# Altium PCB PCB.PcbDoc (part 1 of 4)
Units mm, origin at the board's own origin, x right, y up, seen from the top; angles counter-clockwise.
Board outline 147.57 x 62.6 mm, 4 copper layers (Top Layer, Layer 1, Layer 2, Bottom Layer), stack 1.586 mm thick; 192 components, 139 nets, 594 pads, 161 vias.
Unrouted connection lines stored in the file: 1.
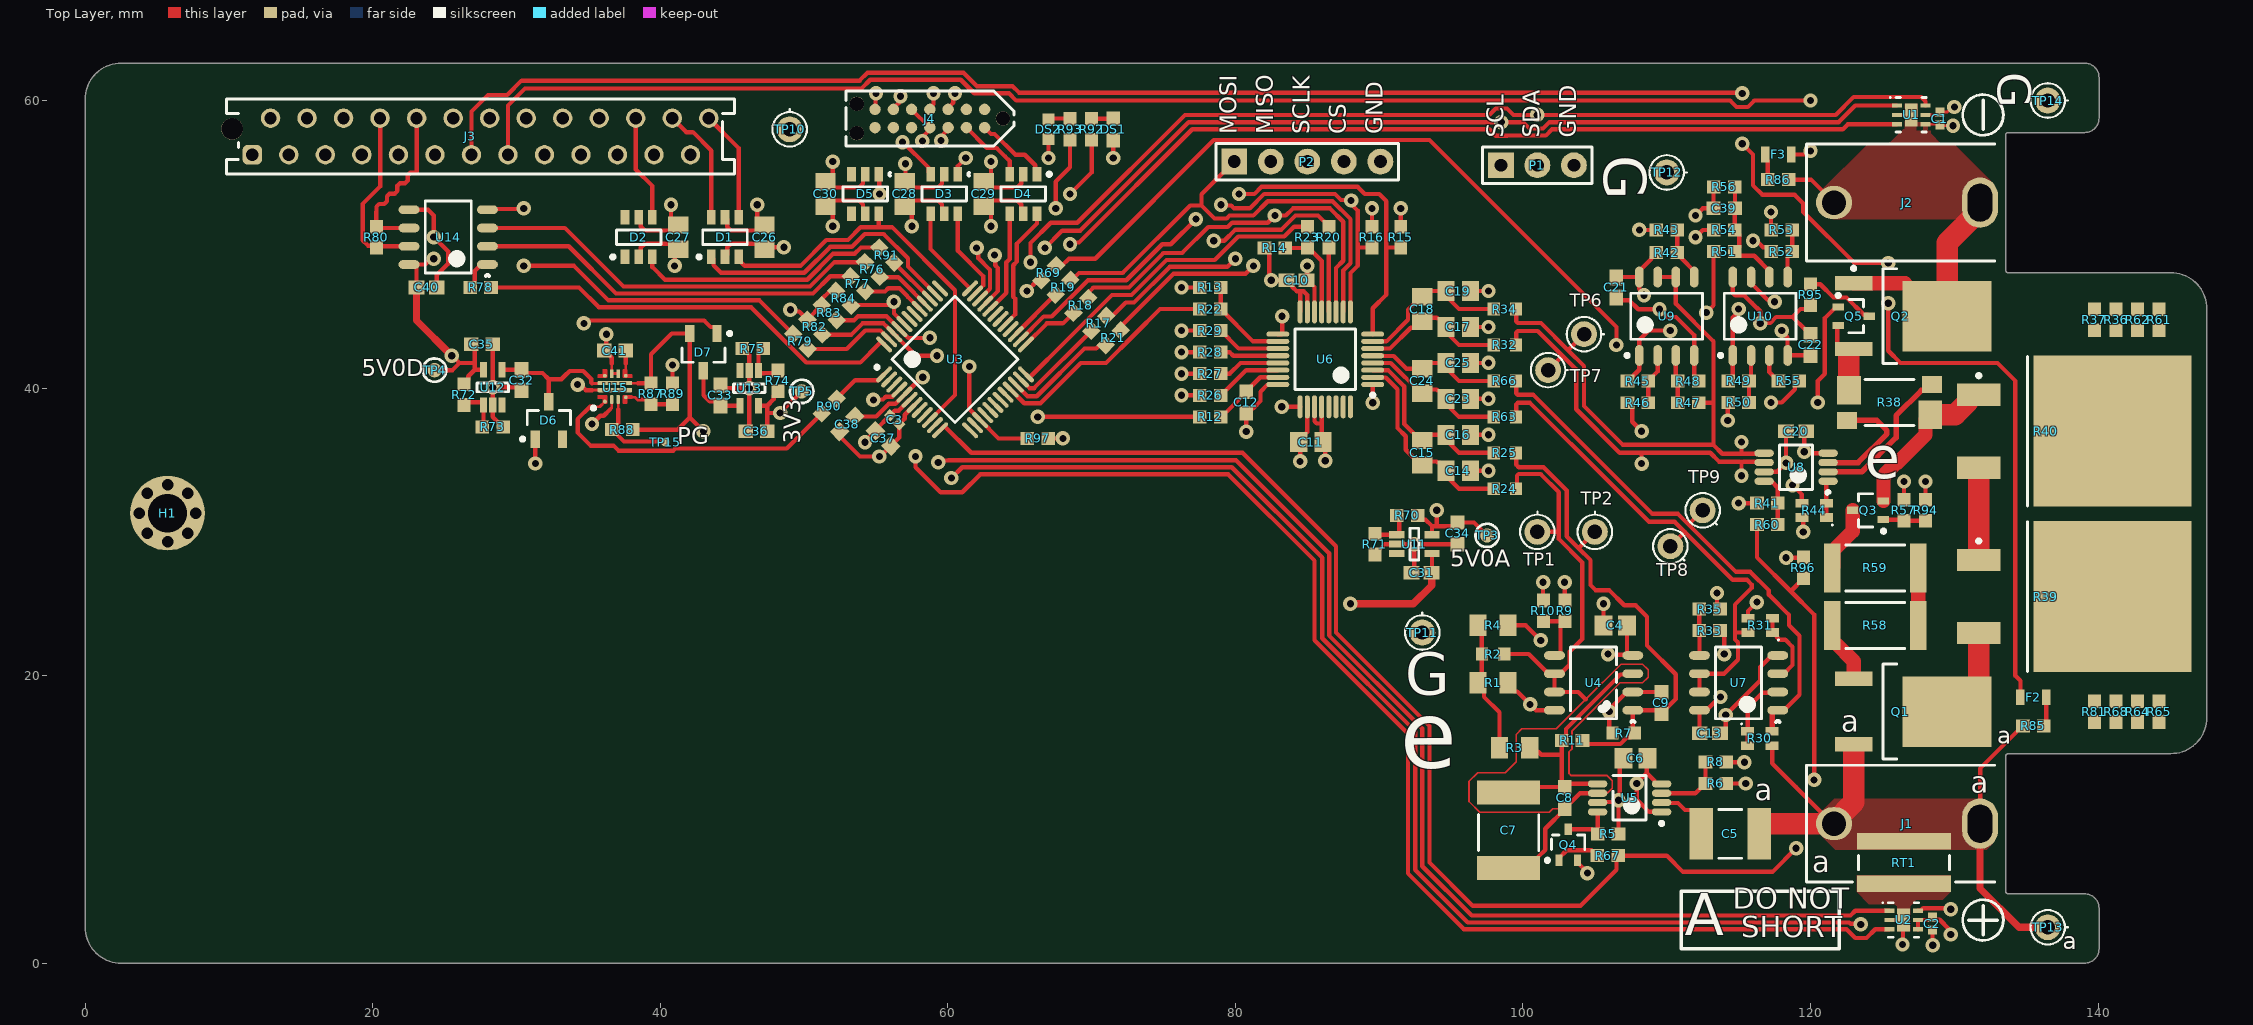
[diagram p0: Top Layer view]
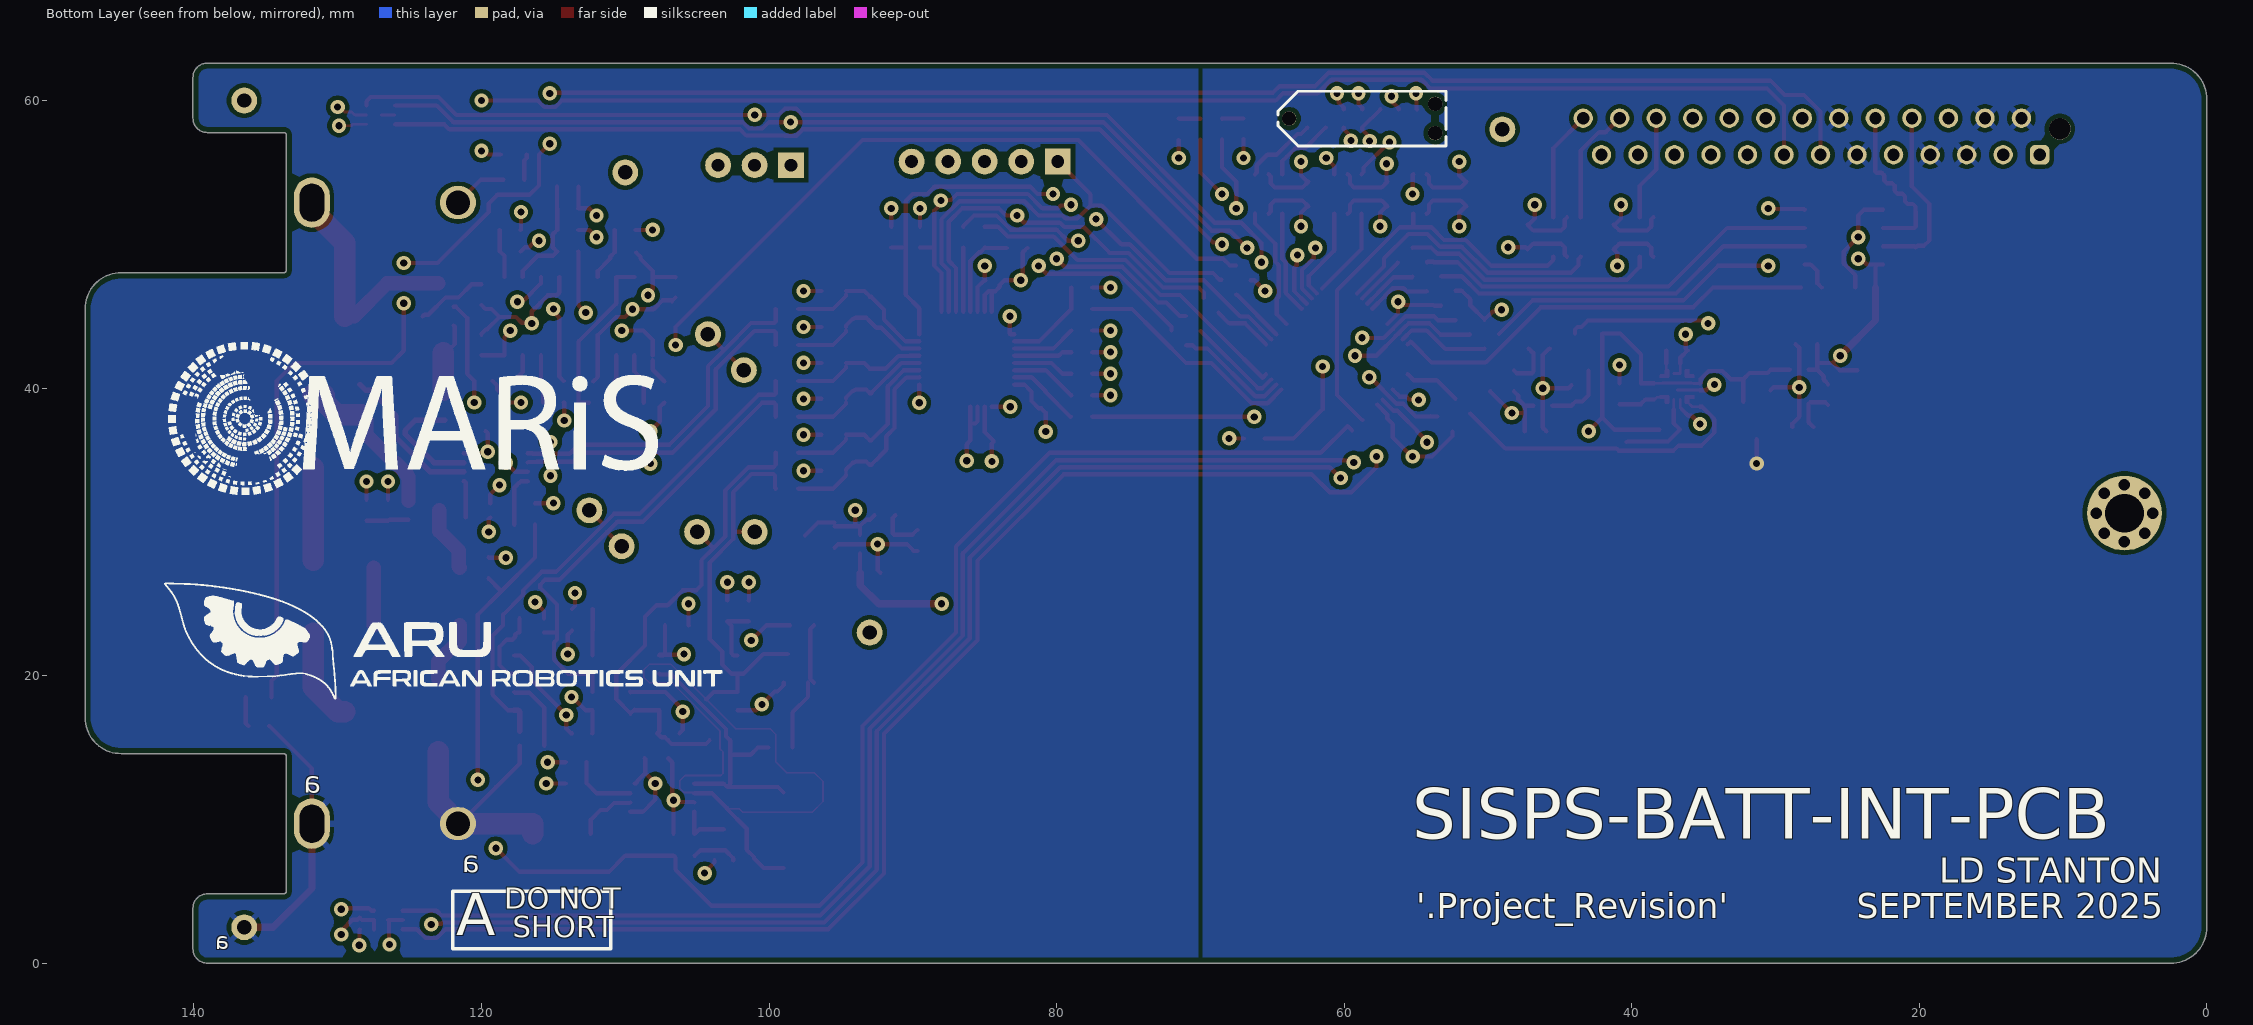
[diagram p1: Bottom Layer view, seen from below]
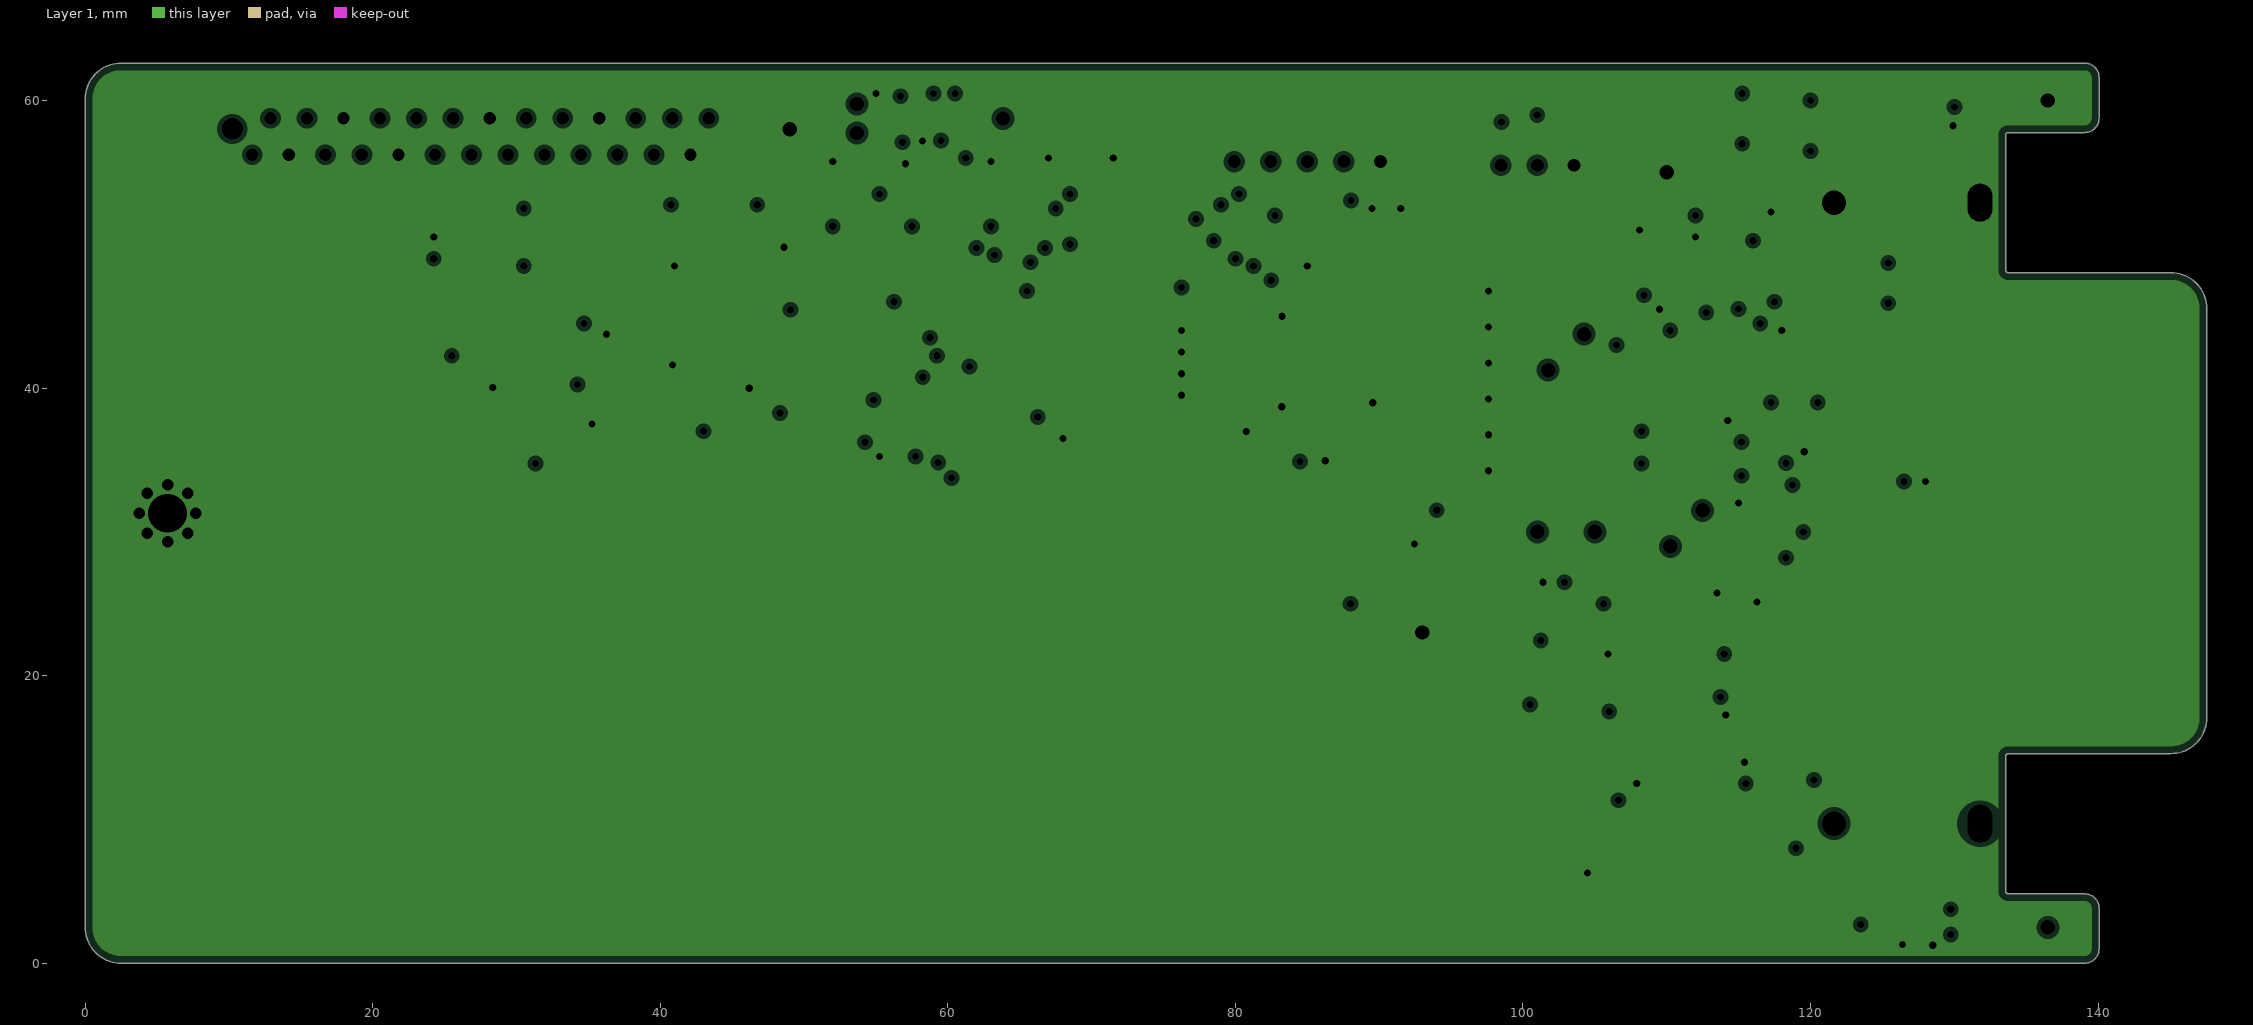
[diagram p2: Layer 1, clearances drawn from the general rule]
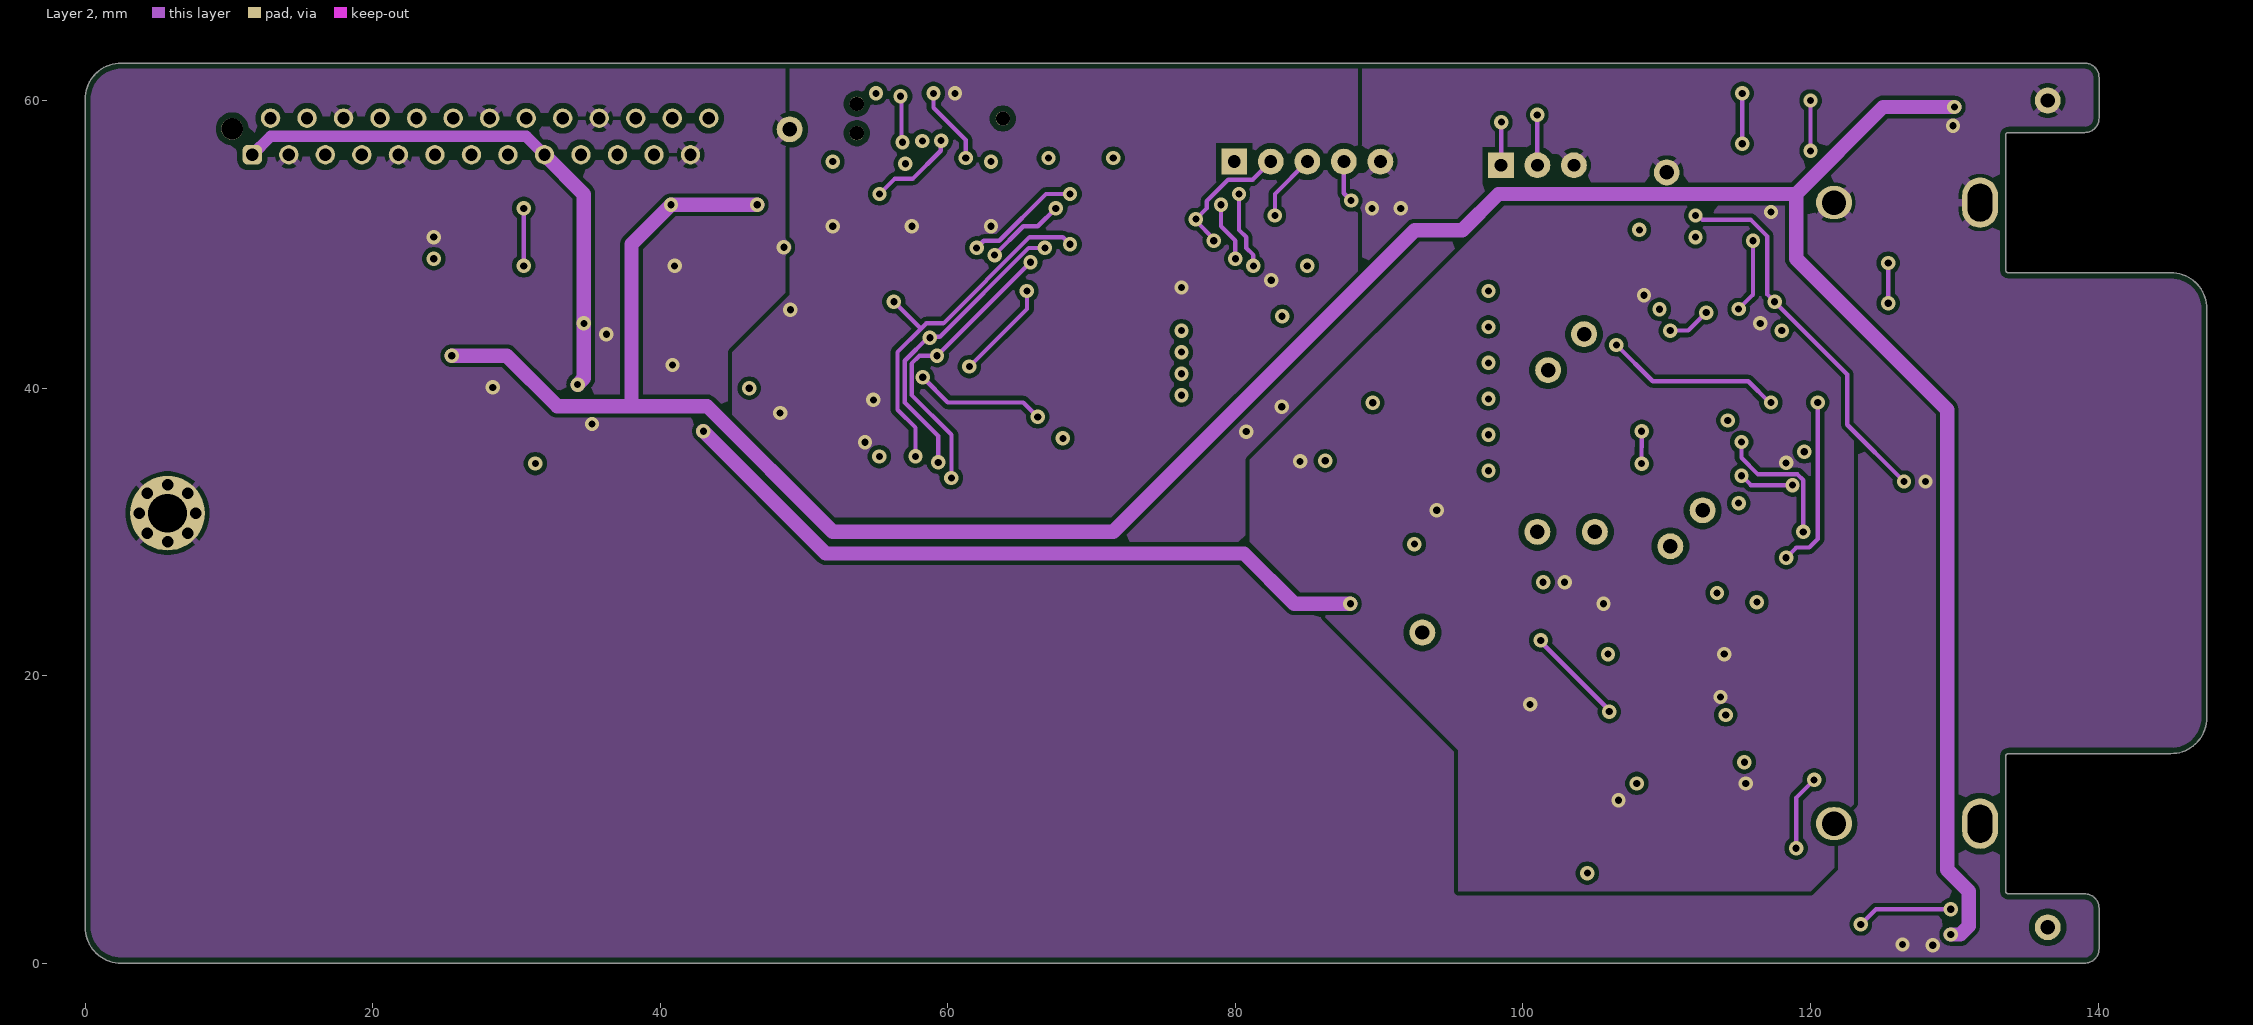
[diagram p3: Layer 2]
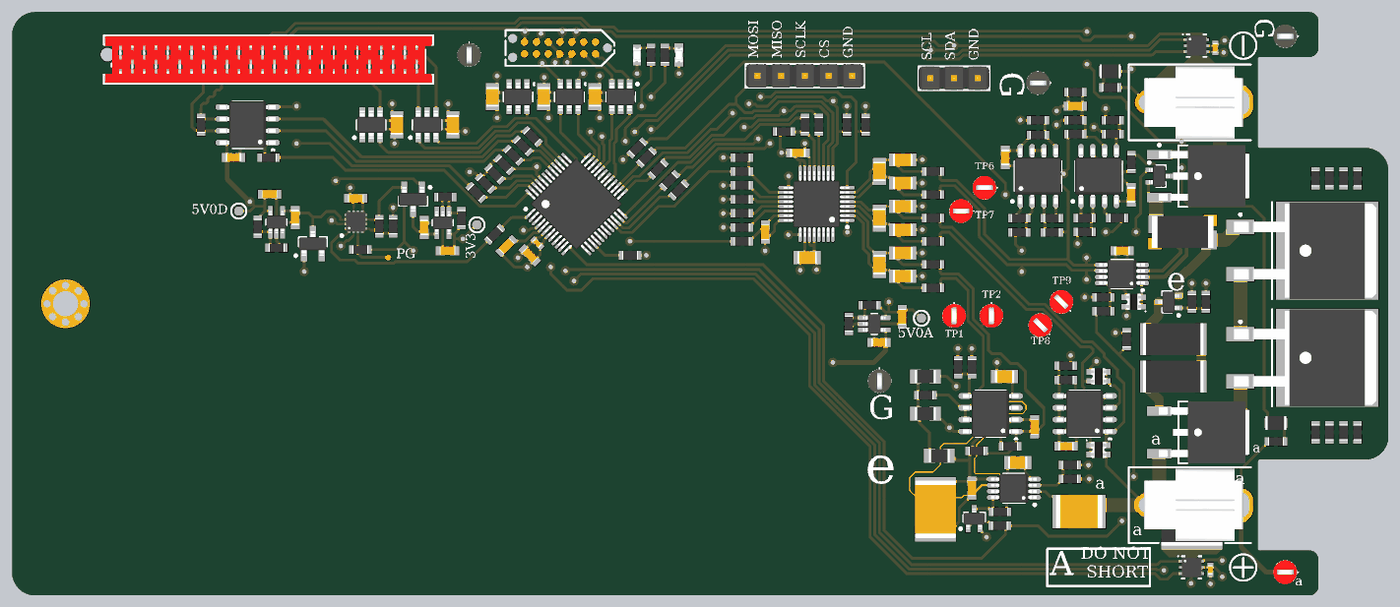
[diagram p6: 3D render of the assembled board from above, using the file's embedded part models]

## Layer stack, top to bottom
Top Solder: solder mask 0.013, SM-002, Dk 3.8
Top Layer: signal copper 0.035
PP1: prepreg 0.2104, PP-022, Dk 4.6
Layer 1: plane copper 0.0152, net GND
Core: core 1.065, FR-4, Dk 4.3
Layer 2: signal copper 0.0152
PP2: prepreg 0.2104, PP-022, Dk 4.6
Bottom Layer: signal copper 0.035
Bottom Solder: solder mask 0.013, SM-002, Dk 3.8

## Board outline
2.498,0.002 cw(c2.498,2.502) -0.002,2.502 -0.002,60.102 cw(c2.498,60.102) 2.498,62.602 139.067,62.602 cw(c139.067,61.602) 140.067,61.602 140.067,58.776 cw(c139.067,58.776) 139.067,57.776 133.767,57.776 ccw(c133.767,57.576) 133.567,57.576 133.567,48.225 ccw(c133.767,48.225) 133.767,48.025 145.067,48.025 cw(c145.067,45.525) 147.567,45.525 147.567,17.078 cw(c145.067,17.078) 145.067,14.578 133.767,14.578 ccw(c133.767,14.378) 133.567,14.378 133.567,5.027 ccw(c133.767,5.027) 133.767,4.827 139.067,4.827 cw(c139.067,3.827) 140.067,3.827 140.067,1.002 cw(c139.067,1.002) 139.067,0.002

## Design rules (kind name [scope] priority, off if disabled: settings)
BoardOutlineClearance [All] p1: gap=0.4 ignorepadtopadclearanceinfootprint=FALSE
Clearance Clearance_IdealDiode [WithinRoom('IdealDiode') vs WithinRoom('IdealDiode')] p1: gap=0.3 ignorepadtopadclearanceinfootprint=TRUE except(0.1: Arc-SMDPad Arc-Fill Arc-Poly Arc-Region Track-SMDPad Track-Fill Track-Poly Track-Region; 0.15: SMDPad-Text THPad-Text; 0.18: Arc-Arc Arc-Track Track-Track; 0.2: SMDPad-Fill SMDPad-Poly SMDPad-Region Fill-Fill Fill-Poly Fill-Region Poly-Poly Poly-Region Region-Region; 0.25: SMDPad-SMDPad; 0.4: Arc-THPad Track-THPad; 0.5: THPad-THPad)
Clearance "Schematic Clearance Constraint_1" [InNet('NetR1_2')] p2: gap=0.5 ignorepadtopadclearanceinfootprint=TRUE
Clearance Clearance_VRMS [InNet('VRMS_DC') vs not InNet('EIS_VRMS_N')] p3: gap=0.5 ignorepadtopadclearanceinfootprint=TRUE
Clearance Clearance_InnerLayerHole [IsVia or IsPad vs OnMid] p4: gap=0 ignorepadtopadclearanceinfootprint=TRUE except(0.15: Arc-Via Track-Via; 0.3: Via-Fill Via-Poly Via-Region; 0.4: THPad-Fill THPad-Poly THPad-Region)
Clearance Clearance_Samenet [All] p5 off: gap=0.1 ignorepadtopadclearanceinfootprint=TRUE
Clearance Clearance_DifNet [All] p6: gap=0.3 ignorepadtopadclearanceinfootprint=TRUE except(0.15: Arc-SMDPad Track-SMDPad SMDPad-Text THPad-Text; 0.18: Arc-Arc Arc-Track Track-Track; 0.2: SMDPad-Fill SMDPad-Poly SMDPad-Region; 0.25: SMDPad-SMDPad; 0.4: Arc-THPad Track-THPad; 0.5: THPad-THPad)
ComponentClearance ComponentClearance_QFN [Footprint Like '*QFN*'] p1: gap=1 collisioncheckmode=3 verticalgap=0.3 showdistances=FALSE donotcheckwithout3dbody=TRUE
ComponentClearance ComponentClearance_QFP/QFP [Footprint Like '*QFP*' vs Footprint Like '*QFP*'] p2: gap=1.5 collisioncheckmode=3 verticalgap=2540 showdistances=FALSE donotcheckwithout3dbody=TRUE
ComponentClearance ComponentClearance_QFP/SOP-SOIC [Footprint Like '*QFP*' vs Footprint Like '*SOP*' or Comment Like '*SOP*' or  Footprint Like '*SOIC*' or Comment Like '*SOIC*'] p3: gap=1.5 collisioncheckmode=3 verticalgap=2540 showdistances=FALSE donotcheckwithout3dbody=TRUE
ComponentClearance ComponentClearance_QFP/SOT [Footprint Like '*QFP*' vs Footprint Like '*SOT*' or Comment Like '*SOT*'] p4: gap=1.5 collisioncheckmode=3 verticalgap=2540 showdistances=FALSE donotcheckwithout3dbody=TRUE
ComponentClearance ComponentClearance_QFP/Chip [Footprint Like '*QFP*' vs HasParameterValue('Package','0402') or HasParameterValue('Package','0603') or HasParameterValue('Package','0805') or HasParameterValue('Package','1206') or HasParameterValue('Case/Package','0402') or HasParameterValue('Case/Package','0603') or HasParameterValue('Case/Package','0805') or HasParameterValue('Case/Package','1206') or Comment Like '*0402*' or Comment Like '*0603*' or Comment Like '*0805*' or Comment Like '*1206*'] p5: gap=0.6 collisioncheckmode=3 verticalgap=2540 showdistances=FALSE donotcheckwithout3dbody=TRUE
ComponentClearance ComponentClearance_SOP-SOIC/SOT [Footprint Like '*SOT*' or Comment Like '*SOT*' vs Footprint Like '*SOP*' or Comment Like '*SOP*' or  Footprint Like '*SOIC*' or Comment Like '*SOIC*'] p6: gap=0.5 collisioncheckmode=3 verticalgap=2540 showdistances=FALSE donotcheckwithout3dbody=TRUE
ComponentClearance ComponentClearance_SOP-SOIC/Chip [HasParameterValue('Package','0402') or HasParameterValue('Package','0603') or HasParameterValue('Package','0805') or HasParameterValue('Package','1206') or HasParameterValue('Case/Package','0402') or HasParameterValue('Case/Package','0603') or HasParameterValue('Case/Package','0805') or HasParameterValue('Case/Package','1206') or Comment Like '*0402*' or Comment Like '*0603*' or Comment Like '*0805*' or Comment Like '*1206*' vs Footprint Like '*SOP*' or Comment Like '*SOP*' or  Footprint Like '*SOIC*' or Comment Like '*SOIC*'] p7: gap=0.5 collisioncheckmode=3 verticalgap=2540 showdistances=FALSE donotcheckwithout3dbody=TRUE
ComponentClearance ComponentClearance_SOT/SOT [Footprint Like '*SOT*' or Comment Like '*SOT*' vs Footprint Like '*SOT*' or Comment Like '*SOT*'] p8: gap=0.3 collisioncheckmode=3 verticalgap=2540 showdistances=FALSE donotcheckwithout3dbody=TRUE
ComponentClearance ComponentClearance_SOT/Chip [HasParameterValue('Package','0402') or HasParameterValue('Package','0603') or HasParameterValue('Package','0805') or HasParameterValue('Package','1206') or HasParameterValue('Case/Package','0402') or HasParameterValue('Case/Package','0603') or HasParameterValue('Case/Package','0805') or HasParameterValue('Case/Package','1206') or Comment Like '*0402*' or Comment Like '*0603*' or Comment Like '*0805*' or Comment Like '*1206*' vs Footprint Like '*SOT*' or Comment Like '*SOT*'] p9: gap=0.3 collisioncheckmode=3 verticalgap=2540 showdistances=FALSE donotcheckwithout3dbody=TRUE
ComponentClearance ComponentClearance_0402/0402 [HasParameterValue('Package','0402') or HasParameterValue('Case/Package','0402') or Comment Like '*0402*' vs HasParameterValue('Package','0402') or HasParameterValue('Case/Package','0402') or Comment Like '*0402*'] p10: gap=0.2 collisioncheckmode=3 verticalgap=0.3 showdistances=FALSE donotcheckwithout3dbody=TRUE
ComponentClearance ComponentClearance_0402/0603 [HasParameterValue('Package','0402') or HasParameterValue('Case/Package','0402') or Comment Like '*0402*' vs HasParameterValue('Package','0603') or HasParameterValue('Case/Package','0603') or Comment Like '*0603*'] p11: gap=0.2 collisioncheckmode=3 verticalgap=0.3 showdistances=FALSE donotcheckwithout3dbody=TRUE
ComponentClearance ComponentClearance_0402/0805 [HasParameterValue('Package','0402') or HasParameterValue('Case/Package','0402') or Comment Like '*0402*' vs HasParameterValue('Package','0805') or HasParameterValue('Case/Package','0805') or Comment Like '*0805*'] p12: gap=0.25 collisioncheckmode=3 verticalgap=0.3 showdistances=FALSE donotcheckwithout3dbody=TRUE
ComponentClearance ComponentClearance_0402/1206 [HasParameterValue('Package','0402') or HasParameterValue('Case/Package','0402') or Comment Like '*0402*' vs HasParameterValue('Package','1206') or HasParameterValue('Case/Package','1206') or Comment Like '*1206*'] p13: gap=0.3 collisioncheckmode=3 verticalgap=0.3 showdistances=FALSE donotcheckwithout3dbody=TRUE
ComponentClearance ComponentClearance_0603/0603 [HasParameterValue('Package','0603') or HasParameterValue('Case/Package','0603') or Comment Like '*0603*' vs HasParameterValue('Package','0603') or HasParameterValue('Case/Package','0603') or Comment Like '*0603*'] p14: gap=0.2 collisioncheckmode=3 verticalgap=0.3 showdistances=FALSE donotcheckwithout3dbody=TRUE
ComponentClearance ComponentClearance_0603/0805 [HasParameterValue('Package','0603') or HasParameterValue('Case/Package','0603') or Comment Like '*0603*' vs HasParameterValue('Package','0805') or HasParameterValue('Case/Package','0805') or Comment Like '*0805*'] p15: gap=0.2 collisioncheckmode=3 verticalgap=0.3 showdistances=FALSE donotcheckwithout3dbody=TRUE
ComponentClearance ComponentClearance_0603/1206 [HasParameterValue('Package','0603') or HasParameterValue('Case/Package','0603') or Comment Like '*0603*' vs HasParameterValue('Package','1206') or HasParameterValue('Case/Package','1206') or Comment Like '*1206*'] p16: gap=0.3 collisioncheckmode=3 verticalgap=0.3 showdistances=FALSE donotcheckwithout3dbody=TRUE
ComponentClearance ComponentClearance_0805/0805 [HasParameterValue('Package','0805') or HasParameterValue('Case/Package','0805') or Comment Like '*0805*' vs HasParameterValue('Package','0805') or HasParameterValue('Case/Package','0805') or Comment Like '*0805*'] p17: gap=0.3 collisioncheckmode=3 verticalgap=0.3 showdistances=FALSE donotcheckwithout3dbody=TRUE
ComponentClearance ComponentClearance_0805/1206 [HasParameterValue('Package','0805') or HasParameterValue('Case/Package','0805') or Comment Like '*0805*' vs HasParameterValue('Package','1206') or HasParameterValue('Case/Package','1206') or Comment Like '*1206*'] p18: gap=0.3 collisioncheckmode=3 verticalgap=0.3 showdistances=FALSE donotcheckwithout3dbody=TRUE
ComponentClearance [All] p19: gap=0.254 collisioncheckmode=3 verticalgap=0.254 showdistances=FALSE
DiffPairsRouting [not InNet('1V0_VGND')] p1: maxlimit=0.5 minlimit=0.25 mostfreqgap=0.25 toplayer_minwidth=0.15 toplayer_maxwidth=0.5 toplayer_prefwidth=0.3 midlayer1_minwidth=0.15 midlayer1_maxwidth=0.5 midlayer1_prefwidth=0.3 bottomlayer_minwidth=0.15 bottomlayer_maxwidth=0.5 bottomlayer_prefwidth=0.3 maxuncoupledlength=12.7
DiffPairsRouting DiffPairsRouting_RS485 [InNetClass('MCU_RS485')] p2: maxlimit=0.5 minlimit=0.25 mostfreqgap=0.25 toplayer_minwidth=0.15 toplayer_maxwidth=0.5 toplayer_prefwidth=0.3 midlayer1_minwidth=0.15 midlayer1_maxwidth=0.5 midlayer1_prefwidth=0.3 bottomlayer_minwidth=0.15 bottomlayer_maxwidth=0.5 bottomlayer_prefwidth=0.3 maxuncoupledlength=12.7
HoleSize HoleSize_PSLT [(SlotHoleLength > 0) and (PadIsPlated = 'True')] p1: absolutevalues=TRUE maxlimit=6 minlimit=0.5 maxpercent=80.000 minpercent=20.000
HoleSize HoleSize_NPSLT [(SlotHoleLength > 0) and (PadIsPlated = 'False')] p2: absolutevalues=TRUE maxlimit=6.3 minlimit=1 maxpercent=80.000 minpercent=20.000
HoleSize HoleSize_NPTH [PadIsPlated = 'False'] p3: absolutevalues=TRUE maxlimit=6.3 minlimit=0.5 maxpercent=80.000 minpercent=20.000
HoleSize [All] p4: absolutevalues=TRUE maxlimit=6.3 minlimit=0.3 maxpercent=80.000 minpercent=20.000
MatchedLengths MatchedLengths_RS485 [InNetClass('MCU_RS485')] p1: tolerance=1 checknetsindiffpair=FALSE checkdiffpairvsdiffpair=TRUE checkxsignals=TRUE checkothers=TRUE
MinimumAnnularRing [PadIsPlated = 'True'] p1: minimumring=0.2
MinimumSolderMaskSliver [All] p1 off: minsoldermaskwidth=0.1
NetAntennae [All] p1: netantennaetolerance=2
PermittedLayers [All] p1: toplayerpermitted=TRUE bottomlayerpermitted=FALSE
PlaneClearance [All] p1: clearance=0.3
PlaneConnect PlaneConnect_BATT [HasFootprint('3547')] p1: planeconnectstyle=Relief reliefexpansion=0.5 reliefentries=4 reliefconductorwidth=1 reliefairgap=0.25 // Battery Terminal Connect
PlaneConnect [All] p2: pad.planeconnectstyle=Relief pad.reliefexpansion=0.5 pad.reliefentries=4 pad.reliefconductorwidth=0.3 pad.reliefairgap=0.25 via.planeconnectstyle=Direct via.reliefexpansion=0.508 via.reliefentries=4 via.reliefconductorwidth=0.254 via.reliefairgap=0.254
PolygonConnect [All] p1: thpad.connectstyle=Relief thpad.reliefconductorwidth=0.4 thpad.reliefentries=4 thpad.polygonreliefangle="45 Angle" thpad.airgapwidth=0.3 thpad.conductorbypadedge=TRUE thpad.mindistance=0.35 thpad.enablemindistance=FALSE smdpad.connectstyle=Relief smdpad.reliefconductorwidth=0.3 smdpad.reliefentries=4 smdpad.polygonreliefangle="90 Angle" smdpad.airgapwidth=0.3 smdpad.conductorbypadedge=TRUE smdpad.mindistance=0.35 smdpad.enablemindistance=FALSE via.connectstyle=Direct via.reliefconductorwidth=0.3 via.reliefentries=4 via.polygonreliefangle="45 Angle" via.airgapwidth=0.3
RoutingVias [All] p1: holewidth=0.5 width=0.8 viastyle="Through Hole" minholewidth=0.3 minwidth=0.5 maxholewidth=1 maxwidth=1.5
SilkToSilkClearance [All] p1 off: silktosilkclearance=0.15
SilkToSolderMaskClearance [IsPad] p1: minsilkscreentomaskgap=0.2 clearancetoexposedcopper=TRUE
SolderMaskExpansion "Schematic Solder Mask Expansion" [InNet('NetR1_2')] p1: expansion=0.2 istentingtop=FALSE
SolderMaskExpansion SolderMaskExpansion_Via [IsVia] p2: expansion=0.1 istentingtop=TRUE
SolderMaskExpansion [All] p3: expansion=0.075 istentingtop=FALSE
SupplyNets "Schematic Supply Nets_5" [InNet('VREG')] p1: voltage=0.000
SupplyNets "Schematic Supply Nets_11" [InNet('5V0D')] p2: voltage=0.000
SupplyNets "Schematic Supply Nets_10" [InNet('VAUX')] p3: voltage=0.000
SupplyNets "Schematic Supply Nets_9" [InNet('5V0A')] p4: voltage=0.000
SupplyNets "Schematic Supply Nets_8" [InNet('3V3')] p5: voltage=0.000
SupplyNets "Schematic Supply Nets_4" [InNet('VBUS')] p6: voltage=0.000
SupplyNets "Schematic Supply Nets_1" [InNet('VBATT')] p7: voltage=0.000
SupplyNets "Schematic Supply Nets" [InNet('GND')] p8: voltage=0.000
UnRoutedNet [All] p1: checkbadconnections=TRUE
Width Width_IdealDiode [WithinRoom('IdealDiode')] p1: maxlimit=0.2 minlimit=0.2 preferedwidth=0.2
Width Width_GR [InNet('EIS_VRMS_N')] p2: maxlimit=1 minlimit=0.12 preferedwidth=0.3 // Guard Ring Thin Traces
Width [All] p3: maxlimit=1.5 minlimit=0.2 preferedwidth=0.3
20 further rules are at their usual default settings.

## Classes and differential pairs
net class R97_Nets: GND MCU_DAC_OUT1
net class R96_Nets: EIS_EN NetQ5_1
net class R95_Nets: 5V0A NetQ5_3
net class R94_Nets: GND NetQ3_1
net class R57_Nets: EL_DRIVE NetQ3_1
net class Q5_Nets: NetQ2_3 NetQ5_1 NetQ5_3
net class P1_Nets: GND I2C_INT.SCL I2C_INT.SDA
net class P2_Nets: ADC_SPI.MISO C\S\_TERM DIN_TERM GND SCLK_TERM
net class R93_Nets: MCU_LED0 NetDS2_A
net class R92_Nets: MCU_LED1 NetDS1_A
net class DS2_Nets: GND NetDS2_A
net class DS1_Nets: GND NetDS1_A
net class R91_Nets: NetD2_3 OK
net class R90_Nets: AUX_5VEN NetR90_2
net class U15_Nets: GND NetC31_1 NetC41_1 NetR87_2 NetR88_2 NetR90_2 NetU15_10 VAUX
net class TP15_Nets: NetR88_2
net class R89_Nets: GND NetR87_2
net class R88_Nets: NetC31_1 NetR88_2
net class R87_Nets: NetC31_1 NetR87_2
net class D7_Nets: NetC31_1 NetC33_1 VAUX
net class D6_Nets: NetC31_1 VBUS VREG
net class C41_Nets: GND NetC41_1
net class TP14_Nets: GND
net class TP13_Nets: VBATT
net class TP12_Nets: GND
net class TP11_Nets: GND
net class TP10_Nets: GND
net class TP9_Nets: EIS_VBATT_P
net class TP8_Nets: EIS_VBATT_N
net class TP7_Nets: EIS_VISENSE_N
net class TP6_Nets: EIS_VISENSE_P
net class TP5_Nets: 3V3
net class TP4_Nets: 5V0D
net class TP3_Nets: 5V0A
net class TP1_Nets: EIS_VRMS_N
net class TP2_Nets: EIS_VRMS_P
net class R86_Nets: GND NetF3_1
net class R85_Nets: NetF2_1 VBATT
net class J1_Nets: VBATT
net class F3_Nets: BATT_SENSE_N NetF3_1
net class F2_Nets: BATT_SENSE_P NetF2_1
component class U_BATT: F2 F3 J1 J2 R85 R86 TP13 TP14
net class R53_Nets: GND NetR52_1
net class R51_Nets: EL_ISENSE_SE NetC39_1
net class C39_Nets: EL_DRIVE NetC39_1
net class R84_Nets: 3V3 I2C_INT_ALERT
net class R83_Nets: 3V3 I2C_INT.SCL
net class R82_Nets: 3V3 I2C_INT.SDA
net class U14_Nets: 5V0D GND RS485_DE RS485_DI RS485_MCU.A RS485_MCU.B RS485_R\E\ RS485_RO
net class RS485_MCU: RS485_MCU.A RS485_MCU.B
net class R81_Nets: RS485_SPARE_1 RS485_SPARE_2
net class R80_Nets: RS485_MCU.A RS485_MCU.B
net class R79_Nets: MCU_RS485_CTRL.UART.Tx RS485_DI
net class R78_Nets: MCU_RS485_CTRL.UART.Rx RS485_RO
net class R77_Nets: MCU_RS485_CTRL.R\E\ RS485_R\E\
net class R76_Nets: MCU_RS485_CTRL.DE RS485_DE
net class MCU_RS485: RS485_MCU.A RS485_MCU.B
net class MCU_RS485_CTRL: MCU_RS485_CTRL.DE MCU_RS485_CTRL.R\E\ MCU_RS485_CTRL.UART.Rx MCU_RS485_CTRL.UART.Tx
net class IDC_RS485: RS485_MCU.A RS485_MCU.B
net class C40_Nets: 5V0D GND
component class U_RS485: C40 R76 R77 R78 R79 R80 R81 U14
net class R69_Nets: MCU_DAC MCU_DAC_OUT1
net class R12_Nets: ADC_VREF MCU_VREF
net class C38_Nets: GND MCU_VREF
net class C37_Nets: 3V3 GND
net class C36_Nets: 3V3 GND
net class C35_Nets: 5V0D GND
net class C34_Nets: 5V0A GND
net class C33_Nets: GND NetC33_1
net class C32_Nets: GND NetC31_1
net class C31_Nets: GND NetC31_1
net class U13_Nets: 3V3 GND NetC33_1 NetR74_2 NetU13_3 NetU13_4
net class U12_Nets: 5V0D GND NetC31_1 NetR72_2 NetU12_3
net class U11_Nets: 5V0A GND NetC31_1 NetR70_2 NetU11_3
net class R75_Nets: GND NetR74_2
net class R74_Nets: 3V3 NetR74_2
net class R73_Nets: GND NetR72_2
net class R72_Nets: 5V0D NetR72_2
net class R71_Nets: GND NetR70_2
net class R70_Nets: 5V0A NetR70_2
component class U_LINREG: C31 C32 C33 C34 C35 C36 C41 D6 D7 R70 R71 R72 R73 R74 R75 R87 R88 R89 R90 TP3 TP4 TP5 TP15 U11 U12 U13 U15
net class MCU_I2C_INT: I2C_INT.SCL I2C_INT.SDA
net class MCU_ADC_SPI: ADC_SPI.\CS ADC_SPI.MISO ADC_SPI.MOSI ADC_SPI.SCLK
net class U3_Nets: 3V3 \RST ADC_D\R\D\Y\ ADC_R\S\T\ ADC_SPI.\CS ADC_SPI.MISO ADC_SPI.MOSI ADC_SPI.SCLK ADC_START AUX_5VEN EIS_EN EN GND I2C_INT.SCL I2C_INT.SDA I2C_INT_ALERT MCU_DAC_OUT1 MCU_LED0 MCU_LED1 MCU_RS485_CTRL.DE MCU_RS485_CTRL.R\E\ MCU_RS485_CTRL.UART.Rx MCU_RS485_CTRL.UART.Tx MCU_VREF NetU3_1 NetU3_2 NetU3_3 NetU3_4 NetU3_5 NetU3_8 NetU3_9 NetU3_11 NetU3_12 NetU3_13 NetU3_14 NetU3_15 NetU3_16 NetU3_17 NetU3_18 NetU3_19 NetU3_20 NetU3_21 NetU3_22 NetU3_23 NetU3_24 NetU3_25 NetU3_26 NetU3_27 NetU3_28 NetU3_29 NetU3_30 NetU3_31 NetU3_32 NetU3_33 NetU3_34 NetU3_37 NetU3_38 NetU3_39 NetU3_40 NetU3_41 NetU3_42 NetU3_43 NetU3_44 NetU3_45 NetU3_46 NetU3_47 NetU3_48 OK SWD.SWCLK SWD.SWDIO SWD_UART.Rx SWD_UART.Tx
net class D3_Nets: 3V3 GND NetU3_1 NetU3_2 NetU3_3 NetU3_4 NetU3_5 NetU3_8 NetU3_9 NetU3_11 NetU3_12 NetU3_13 NetU3_14 NetU3_15 NetU3_16 NetU3_17 NetU3_18 NetU3_19 NetU3_20 NetU3_21 NetU3_22 NetU3_23 NetU3_24 NetU3_25 NetU3_26 NetU3_27 NetU3_28 NetU3_29 NetU3_30 NetU3_31 NetU3_32 NetU3_33 NetU3_34 NetU3_37 NetU3_38 NetU3_39 NetU3_40 NetU3_41 NetU3_42 NetU3_43 NetU3_44 NetU3_45 NetU3_46 NetU3_47 NetU3_48 SWD.SWCLK SWD.SWDIO SWD_SWCLK_CONN SWD_SWDIO_CONN
net class SWD_UART: SWD_UART.Rx SWD_UART.Tx
net class D5_Nets: 3V3 \RST GND NetD5_3 NetD5_4 SWD_NRST_CONN
net class D4_Nets: 3V3 GND SWD_UART.Rx SWD_UART.Tx SWD_UART_RX_CONN SWD_UART_TX_CONN
net class C30_Nets: 3V3 GND
net class C29_Nets: 3V3 GND
net class C28_Nets: 3V3 GND
net class C27_Nets: 5V0D GND
net class C26_Nets: 5V0D GND
component class U_SWD: C28 C29 C30 D3 D4 D5 J4 TC
net class R68_Nets: NetR68_1 NetR68_2
net class R66_Nets: ADC_AIN2 EIS_VBATT_P
net class R32_Nets: ADC_AIN1 EIS_VISENSE_N
net class C17_Nets: ADC_AIN1 GND
net class Q4_Nets: GND NetQ4_1 NetQ4_3
net class R67_Nets: EIS_EN NetQ4_1
net class R63_Nets: ADC_AIN3 EIS_VBATT_N
net class R65_Nets: NetR65_1 NetR65_2
net class R64_Nets: NetR64_1 NetR64_2
net class R62_Nets: NetR62_1 NetR62_2
net class R61_Nets: NetR61_1 NetR61_2
net class C18_Nets: ADC_AIN0 ADC_AIN1
net class C19_Nets: ADC_AIN0 GND
component class "U_VBATT Sense": C13 R30 R31 R33 R35 U7
net class U10_Nets: 5V0A EL_DRIVE EL_ISET_5V EL_ISET_FB GND NetC39_1 NetR52_1 NetR55_2
net class R60_Nets: EIS_EN IAMP_EN
net class R59_Nets: NetQ3_3 NetR58_2
net class R58_Nets: EL_ISET_B NetR58_2
net class R54_Nets: GND NetC39_1
net class R56_Nets: EL_DRIVE NetC39_1
net class R55_Nets: MCU_DAC NetR55_2
net class J2_Nets: GND
net class R50_Nets: EL_ISET_FB GND
net class R52_Nets: EL_ISET_5V NetR52_1
net class R49_Nets: EL_ISET_5V EL_ISET_FB
net class R48_Nets: GND NetR47_2
net class R47_Nets: EIS_VISENSE_P NetR47_2
net class R46_Nets: EIS_VISENSE_N NetR45_1
net class R45_Nets: EL_ISENSE_SE NetR45_1
net class R44_Nets: EIS_VISENSE_N EIS_VISENSE_P IAMP_GAIN
net class Q3_Nets: EL_VSENSE_H NetQ3_1 NetQ3_3
net class C22_Nets: 5V0A GND
net class U9_Nets: 5V0A EIS_VISENSE_P EL_ISENSE_SE GND IAMP_VREF_2V0 NetR45_1 NetR47_2 NetU9_1 NetU9_2 NetU9_3
net class U8_Nets: 5V0A EIS_VISENSE_N EIS_VISENSE_P GND IAMP_EN IAMP_GAIN IAMP_VIN_N IAMP_VIN_P NetU8_1 NetU8_6
net class R42_Nets: 5V0A IAMP_VREF_2V0
net class R43_Nets: GND IAMP_VREF_2V0
net class R41_Nets: GND IAMP_EN
net class Q2_Nets: GND NetQ2_3
net class Q1_Nets: EL_ISET_B NetQ1_2 VBATT
net class C21_Nets: 5V0A GND
net class C20_Nets: 5V0A GND
net class R40_Nets: EL_VSENSE_H NetR39_1 NetR40_2 NetR40_3
net class R39_Nets: NetQ1_2 NetR39_1 NetR39_3
net class R38_Nets: EL_VSENSE_H IAMP_VIN_N IAMP_VIN_P NetQ2_3 NetR38_1 NetR38_3 NetR38_4
component class U_EL: C20 C21 C22 C39 Q1 Q2 Q3 Q5 R38 R39 R40 R41 R42 R43 R44 R45 R46 R47 R48 R49 R50 R51 R52 R53 R54 R55 R56 R57 R58 R59 R60 R94 R95 R96 U8 U9 U10
net class C14_Nets: ADC_AIN5 GND
net class C25_Nets: ADC_AIN2 GND
net class U7_Nets: 5V0A ADC_VREF_2V0 EIS_VBATT_N EIS_VBATT_P GND NetR30_1 NetR31_1
net class R35_Nets: ADC_VREF_2V0 GND
net class R33_Nets: 5V0A ADC_VREF_2V0
net class R34_Nets: ADC_AIN0 EIS_VISENSE_P
net class R31_Nets: EIS_VBATT_N GND NetR31_1
net class R30_Nets: EIS_VBATT_P NetR30_1 VBATT
net class C23_Nets: ADC_AIN3 GND
net class C15_Nets: ADC_AIN4 ADC_AIN5
net class C13_Nets: 5V0A GND
net class R29_Nets: GND NetR29_1
net class R28_Nets: GND NetR28_1
net class R27_Nets: GND NetR27_1
net class R26_Nets: GND NetR26_1
net class R25_Nets: ADC_AIN4 EIS_VRMS_P
net class R24_Nets: ADC_AIN5 EIS_VRMS_N
net class C16_Nets: ADC_AIN4 GND
net class C24_Nets: ADC_AIN2 ADC_AIN3
net class ADC_SPI: ADC_SPI.\CS ADC_SPI.MISO ADC_SPI.MOSI ADC_SPI.SCLK
component class "U_ADC AIN": C14 C15 C16 C17 C18 C19 C23 C24 C25 R24 R25 R32 R34 R36 R37 R61 R62 R63 R64 R65 R66 TP1 TP2 TP6 TP7 TP8 TP9 TP10 TP11 TP12
net class U6_Nets: 3V3 5V0A ADC_AIN0 ADC_AIN1 ADC_AIN2 ADC_AIN3 ADC_AIN4 ADC_AIN5 ADC_REFN0 ADC_REFN1 ADC_REFP0 ADC_REFP1 ADC_VREF C\S\_TERM D\R\D\Y\_TERM DIN_TERM DOUT_TERM GND NetR15_1 NetR26_1 NetR27_1 NetR28_1 NetR29_1 NetU6_1 NetU6_19 NetU6_20 NetU6_21 NetU6_22 NetU6_29 NetU6_30 NetU6_31 NetU6_32 R\S\T\_TERM SCLK_TERM
net class R23_Nets: ADC_D\R\D\Y\ D\R\D\Y\_TERM
net class R22_Nets: ADC_R\S\T\ R\S\T\_TERM
net class R21_Nets: ADC_START NetR15_1
net class R20_Nets: ADC_SPI.MISO DOUT_TERM
net class R19_Nets: ADC_SPI.MOSI DIN_TERM
net class R18_Nets: ADC_SPI.SCLK SCLK_TERM
net class R17_Nets: ADC_SPI.\CS C\S\_TERM
net class R16_Nets: C\S\_TERM GND
net class R15_Nets: GND NetR15_1
net class R14_Nets: 3V3 D\R\D\Y\_TERM
net class R13_Nets: 3V3 R\S\T\_TERM
net class C12_Nets: ADC_VREF GND
net class C11_Nets: 5V0A GND
net class C10_Nets: 3V3 GND
net class ADC_AIN[0..5]: ADC_AIN0 ADC_AIN1 ADC_AIN2 ADC_AIN3 ADC_AIN4 ADC_AIN5 ADC_AIN6
net class R11_Nets: EIS_VRMS_P VRMS_DC
component class U_ADC: C10 C11 C12 P2 R13 R14 R15 R16 R17 R18 R19 R20 R21 R22 R23 R26 R27 R28 R29 U6 U?
net class R10_Nets: GND NetR9_2
net class R9_Nets: 5V0A NetR9_2
net class R8_Nets: GND NetR6_2
net class R7_Nets: EIS_VRMS_P NetC9_1
net class R6_Nets: 5V0A NetR6_2
net class R5_Nets: 5V0A NetQ4_3
net class R4_Nets: NetC9_1 NetR1_2
net class R3_Nets: NetR1_2 VRMS_DC
net class R2_Nets: EIS_VRMS_N NetR1_2
net class R1_Nets: 5V0A NetR1_2
net class C9_Nets: EIS_VRMS_P NetC9_1
net class C8_Nets: EIS_VRMS_N VRMS_DC
net class C7_Nets: EIS_VRMS_N VRMS_DC
net class C6_Nets: 5V0A GND
net class C5_Nets: NetC5_2 VBATT
net class C2_Nets: 5V0D GND
net class U5_Nets: 5V0A EIS_VRMS_N GND NetC5_2 NetQ4_3 NetR6_2 VRMS_DC
net class U4_Nets: 5V0A EIS_VRMS_N EIS_VRMS_P GND NetC9_1 NetR9_2 VRMS_DC
component class U_RMS: C4 C5 C6 C7 C8 C9 Q4 R1 R2 R3 R4 R5 R6 R7 R8 R9 R10 R11 R67 R68 U4 U5
net class U2_Nets: 5V0D GND I2C_INT.SCL I2C_INT.SDA I2C_INT_ALERT NetU3_3
net class SWD: \RST SWD.SWCLK SWD.SWDIO
net class J4_Nets: 3V3 GND NetJ4_13 NetJ4_14 SWD_NC1 SWD_NC2 SWD_NC3 SWD_NC4 SWD_NRST_CONN SWD_SWCLK_CONN SWD_SWDIO_CONN SWD_SWO SWD_UART_RX_CONN SWD_UART_TX_CONN
net class C4_Nets: 5V0A GND
net class J3_Nets: BATT_SENSE_N BATT_SENSE_P GND IDC_EN IDC_OK IDC_R\S\T\ NetJ3_1 NetJ3_2 NetJ3_3 NetJ3_4 NetJ3_5 NetJ3_6 NetJ3_7 NetJ3_8 NetJ3_9 NetJ3_10 NetJ3_11 NetJ3_12 NetJ3_13 NetJ3_14 NetJ3_15 NetJ3_16 NetJ3_17 NetJ3_18 NetJ3_19 NetJ3_20 NetJ3_21 NetJ3_22 NetJ3_23 NetJ3_24 NetJ3_25 NetJ3_26 RS485_MCU.A RS485_MCU.B VAUX VBUS
net class D2_Nets: 5V0D GND IDC_OK NetD2_3 NetD2_4
net class D1_Nets: 5V0D \RST EN GND IDC_EN IDC_R\S\T\
net class C3_Nets: 3V3 GND
component class U_MCU: C3 C37 C38 DS1 DS2 P1 R12 R69 R82 R83 R84 R92 R93 R97 U3
component class "U_IDC Conn": C26 C27 D1 D2 J3 R91
net class U1_Nets: 5V0D GND I2C_INT.SCL I2C_INT.SDA I2C_INT_ALERT
net class RT1_Nets: GND VBATT
net class I2C_INT: I2C_INT.SCL I2C_INT.SDA
net class C1_Nets: 5V0D GND
component class "U_Temp Sense": C1 C2 RT1 U1 U2
net class H1_Nets: GND
differential pair EIS_VISENSE: +EIS_VISENSE_P -EIS_VISENSE_N
differential pair EIS_VBATT: +EIS_VBATT_P -EIS_VBATT_N
differential pair IAMP_VIN: +IAMP_VIN_P -IAMP_VIN_N

## Components (designator, comment, footprint, x,y, rotation, side; value= is the part's Value field where it differs from the comment)
C1 "CL05B104KO5NNNC" "0402_050_5 (Samsumg) B" 129,58.75 r270 top value=100nF
C2 "CL05B104KO5NNNC" "0402_050_5 (Samsumg) B" 128.475,2.758 r270 top value=100nF
C3 "CL05B104KO5NNNC" "0402_050_5 (Samsumg) B" 56.3,37.8 r315 top value=100nF
C4 "CC0805KRX7R9BB104" "0805 (Yageo EA) B" 106.417,23.5 r180 top value=100nF
C5 "ECHU1H104GX9" "1913 (ECHU E2) B" 114.417,9 r180 top value=100nF
C6 "CC0805KRX7R9BB104" "0805 (Yageo EA) B" 107.832,14.253 r180 top value=100nF
C7 "ECH-U1H224GX9" "2416 (Panasonic ECHU) B" 99,9.25 r270 top value=220nF
C8 "CL10C102JB8NNNC" "0603_080_8 (Samsung) B" 102.917,11.5 r270 top value=1nF
C9 "CL10C101JB8NNNC" "0603_080_8 (Samsung) B" 109.632,18.103 r270 top value=100pF
C10 "CC0603KRX7R9BB104" "0603 (Yageo DA) B" 84.25,47.5 r0 top value=100nF
C11 "CL21B334KBFNNNE" "0805_125_F (Samsumg) B" 85.25,36.25 r0 top value=330nF
C12 "CL10A226MQ8NRNC" "0603_080_8 (Samsung) B" 80.75,39 r270 top value=22µF
C13 "CC0603KRX7R9BB104" "0603 (Yageo DA) B" 113,16 r0 top value=100nF
C14 "GRM2195C1H103FA01D" "0805 (Murata GRM) B" 95.5,34.25 r0 top value=10nF
C15 "GRM2165C1H333JA01D" "0805 (Murata GRM) B" 93,35.5 r90 top value=33nF
C16 "GRM2195C1H103FA01D" "0805 (Murata GRM) B" 95.5,36.75 r180 top value=10nF
C17 "GRM2195C1H103FA01D" "0805 (Murata GRM) B" 95.5,44.25 r0 top value=10nF
C18 "GRM2165C1H333JA01D" "0805 (Murata GRM) B" 93,45.5 r90 top value=33nF
C19 "GRM2195C1H103FA01D" "0805 (Murata GRM) B" 95.5,46.75 r180 top value=10nF
C20 "CC0603KRX7R9BB104" "0603 (Yageo DA) B" 119,37 r0 top value=100nF
C21 "CC0603KRX7R9BB104" "0603 (Yageo DA) B" 106.5,47 r270 top value=100nF
C22 "CC0603KRX7R9BB104" "0603 (Yageo DA) B" 120,43 r270 top value=100nF
C23 "GRM2195C1H103FA01D" "0805 (Murata GRM) B" 95.5,39.25 r0 top value=10nF
C24 "GRM2165C1H333JA01D" "0805 (Murata GRM) B" 93,40.5 r90 top value=33nF
C25 "GRM2195C1H103FA01D" "0805 (Murata GRM) B" 95.5,41.75 r180 top value=10nF
C26 "CL21B104KCFNNNE" "0805_125_F (Samsumg) B" 47.25,50.5 r90 top value=100nF
C27 "CL21B104KCFNNNE" "0805_125_F (Samsumg) B" 41.25,50.5 r90 top value=100nF
C28 "CL21B104KCFNNNE" "0805_125_F (Samsumg) B" 57,53.5 r270 top value=100nF
C29 "CL21B104KCFNNNE" "0805_125_F (Samsumg) B" 62.5,53.5 r270 top value=100nF
C30 "CL21B104KCFNNNE" "0805_125_F (Samsumg) B" 51.5,53.5 r270 top value=100nF
C31 "CC0603KRX7R9BB104" "0603 (Yageo DA) B" 92.95,27.15 r180 top value=100nF
C32 "CC0603KRX7R9BB104" "0603 (Yageo DA) B" 30.35,40.55 r270 top value=100nF
C33 "CC0603KRX7R9BB104" "0603 (Yageo DA) B" 44.185,39.495 r90 top value=100nF
C34 "CL10A105KB8NNNC" "0603_080_8 (Samsung) B" 95.45,29.9 r270 top value=1uF
C35 "CL10A105KB8NNNC" "0603_080_8 (Samsung) B" 27.6,43.05 r0 top value=1uF
C36 "CL10A105KB8NNNC" "0603_080_8 (Samsung) B" 46.685,36.995 r180 top value=1uF
C37 "CL10A475KO8NNNC" "0603_080_8 (Samsung) B" 55.5,36.5 r315 top value=4.7uF
C38 "CL10A105KB8NNNC" "0603_080_8 (Samsung) B" 53,37.5 r225 top value=1uF
C39 "CL10B102KB8NNNC" "0603_080_8 (Samsung) B" 114,52.5 r180 top value=1nF
C40 "CC0603KRX7R9BB104" "0603 (Yageo DA) B" 23.75,47 r0 top value=100nF
C41 "CL10B102KB8NNNC" "0603_080_8 (Samsung) B" 36.85,42.61 r180 top value=1nF
D1 "USBLC6-2SC6" "SOT-23-6 (USBLC6-2SC6 ST) B" 44.5,50.5 r90 top
D2 "USBLC6-2SC6" "SOT-23-6 (USBLC6-2SC6 ST) B" 38.5,50.5 r90 top
D3 "USBLC6-2SC6" "SOT-23-6 (USBLC6-2SC6 ST) B" 59.75,53.5 r270 top
D4 "USBLC6-2SC6" "SOT-23-6 (USBLC6-2SC6 ST) B" 65.25,53.5 r270 top
D5 "USBLC6-2SC6" "SOT-23-6 (USBLC6-2SC6 ST) B" 54.25,53.5 r270 top
D6 "BAT54CLT1G" "SOT-23 (BAT45CL) A" 32.25,37.75 r90 top
D7 "BAT54CLT1G" "SOT-23 (BAT45CL) A" 43,42.5 r270 top
DS1 "19-217/GHC-YR1S2/6T" "LED 0603 (Everlight) B" 71.5,58 r90 top
DS2 "KT-0603R" "LED 0603 (Hubei) B" 67,58 r90 top
F2 "PRG21AR420MS1RA" "0805 Fuse (PRG21AR420MS1RA) MRG B" 135.5,18.5 r180 top
F3 "PRG21AR420MS1RA" "0805 Fuse (PRG21AR420MS1RA) MRG B" 117.75,56.25 r0 top
H1 "Mounting Hole M2.5" "Mounting Hole M2.5 Plated Tight Via" 5.731,31.3 r90 top
J1 "3547" 3547 126.715,9.703 r270 top
J2 "3547" 3547 126.715,52.9 r270 top
J3 "690367182672" 690367182672 27.5,57.5 r180 top
J4 "TC2070-IDC-NL" "TC2070 NL" 58.75,58.75 r180 top
P1 "PZ254V-11-03P" "Pin Header 3 1 Male Vertical" 101,55.5 r90 top
P2 "PZ254V-11-05P" "Pin Header 5 1 Male Vertical" 85,55.75 r90 top
Q1 "MJD32CT4" "TO-252 (MJD32C) B" 127.15,17.5 r0 top
Q2 "MJD32CT4" "TO-252 (MJD32C) B" 127.15,45 r0 top
Q3 "DMN601WK-7" "SOT323 (DMN601WK) B" 124,31.5 r180 top
Q4 "DMN601WK-7" "SOT323 (DMN601WK) B" 103.148,8.234 r90 top
Q5 "DMN601WK-7" "SOT323 (DMN601WK) B" 123,45 r0 top
R1 "CRCW080510M0DHEAP" "0805 (Vishay DCRCW-P) A" 97.917,19.5 r180 top value=10M
R2 "RT0603BRD071ML" "0603 (Yageo RT) B" 97.917,21.5 r180 top value=1M
R3 "CRCW080510M0DHEAP" "0805 (Vishay DCRCW-P) A" 99.417,15 r0 top value=10M
R4 "CRCW080510M0DHEAP" "0805 (Vishay DCRCW-P) A" 97.917,23.5 r0 top value=10M
R5 "0603WAF1002T5E" "0603 (Uniroyal) B" 105.917,9 r180 top value=10K
R6 "0603WAF1003T5E" "0603 (Uniroyal) B" 113.417,12.5 r180 top value=100K
R7 "RT0603BRD0784K5L" "0603 (Yageo RT) B" 107,16 r0 top value=84.5k
R8 "0603WAF1003T5E" "0603 (Uniroyal) B" 113.417,14 r0 top value=100K
R9 "0603WAF3303T5E" "0603 (Uniroyal) B" 102.917,24.5 r270 top value=330K
R10 "0603WAF8202T5E" "0603 (Uniroyal) B" 101.417,24.5 r90 top value=82K
R11 "0603WAF0000T5E" "0603 (Uniroyal) B" 103.417,15.5 r0 top value=0R0
R12 "0603WAF0000T5E" "0603 (Uniroyal) B" 78.25,38 r180 top value=0R0
R13 "0603WAF1002T5E" "0603 (Uniroyal) B" 78.25,47 r0 top value=10K
R14 "0603WAF1002T5E" "0603 (Uniroyal) B" 82.75,49.75 r0 top value=10K
R15 "0603WAF1002T5E" "0603 (Uniroyal) B" 91.5,50.5 r90 top value=10K
R16 "0603WAF1002T5E" "0603 (Uniroyal) B" 89.5,50.5 r90 top value=10K
R17 "0603WAF470JT5E" "0603 (Uniroyal) B" 70.5,44.5 r45 top value=47R
R18 "0603WAF470JT5E" "0603 (Uniroyal) B" 69.25,45.75 r45 top value=47R
R19 "0603WAF470JT5E" "0603 (Uniroyal) B" 68.013,47.013 r45 top value=47R
R20 "0603WAF470JT5E" "0603 (Uniroyal) B" 86.5,50.5 r270 top value=47R
R21 "0603WAF470JT5E" "0603 (Uniroyal) B" 71.5,43.5 r45 top value=47R
R22 "0603WAF470JT5E" "0603 (Uniroyal) B" 78.25,45.5 r0 top value=47R
R23 "0603WAF470JT5E" "0603 (Uniroyal) B" 85,50.5 r270 top value=47R
R24 "RT0603BRD073K9L" "0603 (Yageo RT) B" 98.75,33 r180 top value=3K9
R25 "RT0603BRD073K9L" "0603 (Yageo RT) B" 98.75,35.5 r180 top value=3K9
R26 "0603WAF1002T5E" "0603 (Uniroyal) B" 78.25,39.5 r180 top value=10K
R27 "0603WAF1002T5E" "0603 (Uniroyal) B" 78.25,41 r180 top value=10K
R28 "0603WAF1002T5E" "0603 (Uniroyal) B" 78.25,42.5 r180 top value=10K
R29 "0603WAF1002T5E" "0603 (Uniroyal) B" 78.25,44 r180 top value=10K
R30 "ACASN1002S1003P1AT" "0606 (Vishay ACASN) B" 116.481,15.634 r0 top value=10K
R31 "ACASN1002S1003P1AT" "0606 (Vishay ACASN) B" 116.5,23.5 r180 top value=10K
R32 "RT0603BRD073K9L" "0603 (Yageo RT) B" 98.75,43 r180 top value=3K9
R33 "0603WAF1503T5E" "0603 (Uniroyal) B" 112.981,23.134 r180 top value=150K
R34 "RT0603BRD073K9L" "0603 (Yageo RT) B" 98.75,45.5 r180 top value=3K9
R35 "0603WAF1003T5E" "0603 (Uniroyal) B" 112.981,24.634 r0 top value=100K
R36 "0603WAF0000T5E" "0603 (Uniroyal) B" 141.25,44.75 r90 top value=0R0
R37 "0603WAF0000T5E" "0603 (Uniroyal) B" 139.75,44.75 r90 top value=0R0
R38 "PCSR2512BR100M6" "2512 (Resi PCSR2512) MRG" 125.5,39 r0 top value=100mR
R39 "TPAL0263F3R30K9" "TO-263 (TPAL0263) B" 138.35,25.5 r0 top value=3R3
R40 "TPAL0263F3R30K9" "TO-263 (TPAL0263) B" 138.35,37 r0 top value=3R3
R41 "0603WAF1002T5E" "0603 (Uniroyal) B" 117,32 r180 top value=10K
R42 "0603WAF1503T5E" "0603 (Uniroyal) B" 109.995,49.429 r0 top value=150K
R43 "0603WAF1003T5E" "0603 (Uniroyal) B" 110,51 r180 top value=100K
R44 "ACASN1002S1003P1AT" "0606 (Vishay ACASN) B" 120.25,31.5 r180 top value=10K
R45 "0603WAF1003T5E" "0603 (Uniroyal) B" 107.995,40.479 r180 top value=100K
R46 "0603WAF1003T5E" "0603 (Uniroyal) B" 107.995,38.979 r0 top value=100K
R47 "0603WAF1003T5E" "0603 (Uniroyal) B" 111.495,38.979 r180 top value=100K
R48 "0603WAF1003T5E" "0603 (Uniroyal) B" 111.495,40.479 r180 top value=100K
R49 "0603WAF1003T5E" "0603 (Uniroyal) B" 115,40.5 r180 top value=100K
R50 "0603WAF1003T5E" "0603 (Uniroyal) B" 115,39 r0 top value=100K
R51 "0603WAF1003T5E" "0603 (Uniroyal) B" 114,49.5 r180 top value=100K
R52 "0603WAF1003T5E" "0603 (Uniroyal) B" 118,49.5 r180 top value=100K
R53 "0603WAF1003T5E" "0603 (Uniroyal) B" 118,51 r0 top value=100K
R54 "0603WAF1003T5E" "0603 (Uniroyal) B" 114,51 r0 top value=100K
R55 "0603WAF470JT5E" "0603 (Uniroyal) B" 118.5,40.5 r180 top value=47R
R56 "0603WAF5103T5E" "0603 (Uniroyal) B" 114,54 r180 top value=510K
R57 "0603WAF1002T5E" "0603 (Uniroyal) B" 126.5,31.5 r270 top value=10K
R58 "25121WF680JT4E" "2512 (Uniroyal) B" 124.5,23.5 r0 top value=68R
R59 "25121WF680JT4E" "2512 (Uniroyal) B" 124.5,27.5 r180 top value=68R
R60 "0603WAF470JT5E" "0603 (Uniroyal) B" 117,30.5 r0 top value=47R
R61 "0603WAF0000T5E" "0603 (Uniroyal) B" 144.25,44.75 r90 top value=0R0
R62 "0603WAF0000T5E" "0603 (Uniroyal) B" 142.75,44.75 r90 top value=0R0
R63 "RT0603BRD073K9L" "0603 (Yageo RT) B" 98.75,38 r180 top value=3K9
R64 "0603WAF0000T5E" "0603 (Uniroyal) B" 142.75,17.5 r90 top value=0R0
R65 "0603WAF0000T5E" "0603 (Uniroyal) B" 144.25,17.5 r90 top value=0R0
R66 "RT0603BRD073K9L" "0603 (Yageo RT) B" 98.75,40.5 r180 top value=3K9
R67 "0603WAF470JT5E" "0603 (Uniroyal) B" 105.898,7.484 r180 top value=47R
R68 "0603WAF0000T5E" "0603 (Uniroyal) B" 141.25,17.5 r90 top value=0R0
R69 "0603WAF0000T5E" "0603 (Uniroyal) B" 67.013,48.013 r225 top value=0R0
R70 "0603WAF1604T5E" "0603 (Uniroyal) B" 91.95,31.15 r180 top value=1M6
R71 "0603WAF5103T5E" "0603 (Uniroyal) B" 89.7,29.15 r270 top value=510K
R72 "0603WAF1604T5E" "0603 (Uniroyal) B" 26.35,39.55 r270 top value=1M6
R73 "0603WAF5103T5E" "0603 (Uniroyal) B" 28.35,37.3 r0 top value=510K
R74 "0603WAF4703T5E" "0603 (Uniroyal) B" 48.185,40.495 r90 top value=470K
R75 "0603WAF2703T5E" "0603 (Uniroyal) B" 46.435,42.745 r180 top value=270K
R76 "0603WAF470JT5E" "0603 (Uniroyal) B" 54.75,48.25 r315 top value=47R
R77 "0603WAF470JT5E" "0603 (Uniroyal) B" 53.75,47.25 r315 top value=47R
R78 "0603WAF470JT5E" "0603 (Uniroyal) B" 27.5,47 r0 top value=47R
R79 "0603WAF470JT5E" "0603 (Uniroyal) B" 49.75,43.25 r315 top value=47R
R80 "0603WAF1200T5E" "0603 (Uniroyal) B" 20.25,50.5 r90 top value=120R
R81 "0603WAF1200T5E" "0603 (Uniroyal) B" 139.75,17.5 r90 top value=120R
R82 "0603WAF4701T5E" "0603 (Uniroyal) B" 50.75,44.25 r315 top value=4K7
R83 "0603WAF4701T5E" "0603 (Uniroyal) B" 51.75,45.25 r315 top value=4K7
R84 "0603WAF4701T5E" "0603 (Uniroyal) B" 52.75,46.25 r315 top value=4K7
R85 "0603WAF470JT5E" "0603 (Uniroyal) B" 135.5,16.5 r0 top value=47R
R86 "0603WAF470JT5E" "0603 (Uniroyal) B" 117.75,54.5 r180 top value=47R
R87 "0603WAF1503T5E" "0603 (Uniroyal) B" 39.35,39.61 r270 top value=150K
R88 "0603WAF1503T5E" "0603 (Uniroyal) B" 37.35,37.11 r180 top value=150K
R89 "0603WAF4702T5E" "0603 (Uniroyal) B" 40.85,39.61 r90 top value=47K
R90 "0603WAF470JT5E" "0603 (Uniroyal) B" 51.75,38.75 r225 top value=47R
R91 "0603WAF470JT5E" "0603 (Uniroyal) B" 55.75,49.25 r135 top value=47R
R92 "0603WAF1001T5E" "0603 (Uniroyal) B" 70,58 r90 top value=1K
R93 "0603WAF1001T5E" "0603 (Uniroyal) B" 68.5,58 r90 top value=1K
R94 "0603WAF1004T5E" "0603 (Uniroyal) B" 128,31.5 r90 top value=1M0
R95 "0603WAF4701T5E" "0603 (Uniroyal) B" 120,46.5 r90 top value=4K7
R96 "0603WAF470JT5E" "0603 (Uniroyal) B" 119.5,27.5 r270 top value=47R
R97 "0603WAF1003T5E" "0603 (Uniroyal) B" 66.25,36.5 r0 top value=100K
RT1 "THJP1225AST1" "RESC3264X09N B" 126.5,7 r90 top
TP1 "5000" "Test Point Keystone 5000" 101,30 r90 top
TP2 "5000" "Test Point Keystone 5000" 105,30 r90 top
TP3 "Test Point" "Test Point Pad 1.0mm" 97.5,29.75 r90 top
TP4 "Test Point" "Test Point Pad 1.0mm" 24.3,41.25 r90 top
TP5 "Test Point" "Test Point Pad 1.0mm" 49.835,39.77 r0 top
TP6 "5000" "Test Point Keystone 5000" 104.25,43.75 r0 top
TP7 "5000" "Test Point Keystone 5000" 101.75,41.25 r0 top
TP8 "5000" "Test Point Keystone 5000" 110.25,29 r315 top
TP9 "5000" "Test Point Keystone 5000" 112.5,31.5 r315 top
TP10 "5001" "Test Point Keystone 5001" 49,58 r90 top
TP11 "5001" "Test Point Keystone 5001" 93,23 r90 top
TP12 "5001" "Test Point Keystone 5001" 110,55 r0 top
TP13 "5000" "Test Point Keystone 5000" 136.5,2.5 r0 top
TP14 "5001" "Test Point Keystone 5001" 136.5,60 r0 top
TP15 "Test Point" "Test Point Pad 0.6mm" 40.344,36.25 r180 top
U1 "TMP116NAIDRVR" "SON (DRV006B) EP B" 127,59 r0 top
U2 "TMP116NAIDRVR" "SON (DRV006B) EP B" 126.475,3.008 r0 top
U3 "STM32G071CBT6" "LQFP48 (STM32G0) B" 60.5,42 r45 top
U4 "TLC2272AMDR" "SOIC-8 (D008A) B" 104.917,19.5 r180 top
U5 "LTC1966MPMS8#TRPBF" "MSOP-8 (LTC1966) B" 107.417,11.5 r180 top
U6 "ADS124S08IPBSR" "QFP-32 (ADS124) A" 86.25,42 r180 top
U7 "TLC2272AMDR" "SOIC-8 (D008A) B" 115,19.5 r180 top
U8 "INA331IDGKR" "MSOP-8 (INA331) B" 119,34.5 r180 top
U9 "TLC2272AMDR" "SOIC-8 (D008A) B" 110,45 r90 top
U10 "TLC2272AMDR" "SOIC-8 (D008A) B" 116.5,45 r90 top
U11 "TPS71501MDCKREP" "SOT-5 (DCK0005A) A" 92.45,29.15 r0 top
U12 "TPS71501MDCKREP" "SOT-5 (DCK0005A) A" 28.35,40.05 r90 top
U13 "TPS71501MDCKREP" "SOT-5 (DCK0005A) A" 46.185,39.995 r270 top
U14 "ST485EXDR" "SO-8 (ST485E) B" 25.25,50.5 r180 top
U15 "LM73100RPWR" "VQFN-10 (LM73100) MFG" 36.85,40.11 r90 top

## Footprints (in the part's own frame and the unit in brackets; to place one, negate y for a bottom-side part, rotate by r counter-clockwise, add the part's x,y. Pads: shape width x height; smd on the part's side, far side on the other; paste and mask are expansions set on the pad)
"0402_050_5 (Samsumg) B" [mm] "Chip Capacitor, 2-Leads, Body 1.00x0.50mm, IPC Medium Density"
  rect 0.66x0.62 smd: 1(-0.44,0) 2(0.44,0)
  body extent -0.53,-0.28 0.53,0.28, height 0.55
"0603 (Uniroyal) B" [mm] "Chip Resistor, 2-Leads, Body 1.60x0.80mm, IPC Medium Density"
  rect 0.95x0.9 smd: 1(-0.725,0) 2(0.725,0)
  body extent -0.85,-0.45 0.85,0.45, height 0.55
"0603 (Yageo DA) B" [mm] "Chip Capacitor, 2-Leads, Body 1.60x0.80mm, IPC Medium Density"
  rect 1.1x0.95 smd: 1(-0.7,0) 2(0.7,0)
  body extent -0.85,-0.45 0.85,0.45, height 0.9
"0603 (Yageo RT) B" [mm] "Chip Resistor, 2-Leads, Body 1,60x0,80mm, IPC Medium Density"
  rect 0.85x0.9 smd: 1(-0.775,0) 2(0.775,0)
  body extent -0.85,-0.45 0.85,0.45, height 0.55
"0603_080_8 (Samsung) B" [mm] "Chip Capacitor, 2-Leads, Body 1.60x0.80mm, IPC Medium Density"
  rect 1x0.95 smd: 1(-0.75,0) 2(0.75,0)
  body extent -0.85,-0.45 0.85,0.45, height 0.9
"0606 (Vishay ACASN) B" [mm] "Chip Array, ConvexE, 4-Leads, Pitch 1,00mm,  Body 1,60x1,50mm,  IPC Medium Density"
  rect 0.9x0.6 smd: 1(-0.85,0.5) 2(-0.85,-0.5) 3(0.85,-0.5) 4(0.85,0.5)
  silkscreen extent -1.32,0.97 -1.22,1.07, body extent -0.87,-0.87 0.87,0.87, height 0.55
"0805 (Murata GRM) B" [mm] "Chip Capacitor, 2-Leads, Body 2,00x1,25mm, IPC Medium Density"
  rect 1.2x1.4 smd: 1(-0.85,0) 2(0.85,0)
  body extent -1.05,-0.67 1.05,0.67, height 0.95
"0805 (Vishay DCRCW-P) A" [mm] "Chip Resistor, 2-Leads, Body 2,05x1,25mm, IPC Low Density"
  rect 1.2x1.5 smd: 1(-1.05,0) 2(1.05,0)
  body extent -1.1,-0.7 1.1,0.7, height 0.5
"0805 (Yageo EA) B" [mm] "Chip Capacitor, 2-Leads, Body 2.00x1.25mm, IPC Medium Density"
  rect 1.25x1.4 smd: 1(-0.825,0) 2(0.825,0)
  body extent -1.05,-0.67 1.05,0.67, height 0.95
"0805 Fuse (PRG21AR420MS1RA) MRG B" [mm] "Chip Fuse, 2-Leads, Body 2,00x1,25mm, IPC Medium Density"
  rect 0.6x1.1 smd: 1(-0.9,0) 2(0.9,0)
  body extent -1.1,-0.72 1.1,0.72, height 1.1
"0805_125_F (Samsumg) B" [mm] "Chip Capacitor, 2-Leads, Body 2.00x1.25mm, IPC Medium Density"
  rect 1.2x1.4 smd: 1(-0.85,0) 2(0.85,0)
  body extent -1.05,-0.67 1.05,0.67, height 1.35
"1913 (ECHU E2) B" [mm] "Chip Capacitor, 2-Leads, Body 4,80x3,30mm, IPC Medium Density"
  rect 1.65x3.6 smd: 1(-2.025,0) 2(2.025,0)
  silkscreen extent -0.8,-1.7 0.8,1.7, body extent -2.5,-1.8 2.5,1.8, height 2.3
"2416 (Panasonic ECHU) B" [mm] "Chip Capacitor, 2-Leads, Body 6,00x4,10mm, IPC Medium Density"
  rect 1.65x4.4 smd: 1(-2.625,0) 2(2.625,0)
  silkscreen extent -1.09,-2.1 1.4,2.1, body extent -3.1,-2.2 3.1,2.2, height 3
"2512 (Resi PCSR2512) MRG" [mm] "Chip Current Sense Resistor, 4-Leads, Body 6,40x3,20mm, IPC Medium Density"
  rect 1.65x2 smd: 1(-2.825,0.85) 2(2.825,-0.85)
  rect 1.4x1.2 smd paste-2539.97 mask+0.102: 3(-2.95,-1.25) 4(2.95,1.25)
  silkscreen extent -1.7,-1.6 1.7,1.6, body extent -3.3,-1.7 3.3,1.7, height 0.9
"2512 (Uniroyal) B" [mm] "Chip Resistor, 2-Leads, Body 6.35x3.20mm, IPC Medium Density"
  rect 1.15x3.4 smd: 1(-3,0) 2(3,0)
  silkscreen extent -2.05,-1.6 2.05,1.6, body extent -3.22,-1.7 3.22,1.7, height 0.65
3547 [mm] "Female PCB Quick Connect Terminal 6.4mm Tab"
  oval 3.5x2.5 hole 1.7 slot 2.64 at 0 deg paste-2539.97 mask+0.102: 1A(0,5.08)
  oval 2.3x2.5 hole 1.7 paste-2539.97 mask+0.102: 1B(0,-5.08)
  silkscreen extent -4.06,-6.98 4.06,6.1, body extent -3.87,-5.33 3.87,5.23, height 4.04
690367182672 [mm] "MiniModule Connectors, PCB Type, Female, THT, Vertical, 26p"
  rrect50% 1.35x1.35 hole 0.85: 1(15.875,1.27)
  round 1.35 hole 0.85: 2(14.605,-1.27) 3(13.335,1.27) 4(12.065,-1.27) 5(10.795,1.27) 6(9.525,-1.27) 7(8.255,1.27) 8(6.985,-1.27) 9(5.715,1.27) 10(4.445,-1.27) 11(3.175,1.27) 12(1.905,-1.27) 13(0.635,1.27) 14(-0.635,-1.27) 15(-1.905,1.27) 16(-3.175,-1.27) 17(-4.445,1.27) 18(-5.715,-1.27) 19(-6.985,1.27) 20(-8.255,-1.27) 21(-9.525,1.27) 22(-10.795,-1.27) 23(-12.065,1.27) 24(-13.335,-1.27) 25(-14.605,1.27) 26(-15.875,-1.27)
  round 1.5 hole 1.5 unplated: MH1(17.275,-0.53)
  silkscreen extent -17.66,-2.6 17.66,2.6, body extent -17.51,-2.5 17.51,2.5, height 4.25
"LED 0603 (Everlight) B" [mm] "Chip Diode, 2-Leads, Body 1.60x0.80mm, IPC Medium Density"
  rect 1x0.95 smd: A(0.75,0) K(-0.75,0)
  body extent -0.8,-0.4 0.8,0.4, height 0.8
"LED 0603 (Hubei) B" [mm] "Chip Diode, 2-Leads, Body 1.60x0.70mm, IPC Medium Density"
  rect 0.85x0.85 smd: A(0.675,0) K(-0.675,0)
  body extent -0.8,-0.4 0.8,0.4, height 0.8
"LQFP48 (STM32G0) B" [mm] "TSQFP, 48-Leads, Body 7.00x7.00mm, Pitch 0.50mm, IPC Medium Density"
  oval 1.45x0.3 smd: 1(-4.225,2.75) 2(-4.225,2.25) 3(-4.225,1.75) 4(-4.225,1.25) 5(-4.225,0.75) 6(-4.225,0.25) 7(-4.225,-0.25) 8(-4.225,-0.75) 9(-4.225,-1.25) 10(-4.225,-1.75) 11(-4.225,-2.25) 12(-4.225,-2.75) 25(4.225,-2.75) 26(4.225,-2.25) 27(4.225,-1.75) 28(4.225,-1.25) 29(4.225,-0.75) 30(4.225,-0.25) 31(4.225,0.25) 32(4.225,0.75) 33(4.225,1.25) 34(4.225,1.75) 35(4.225,2.25) 36(4.225,2.75)
  oval 0.3x1.45 smd: 13(-2.75,-4.225) 14(-2.25,-4.225) 15(-1.75,-4.225) 16(-1.25,-4.225) 17(-0.75,-4.225) 18(-0.25,-4.225) 19(0.25,-4.225) 20(0.75,-4.225) 21(1.25,-4.225) 22(1.75,-4.225) 23(2.25,-4.225) 24(2.75,-4.225) 37(2.75,4.225) 38(2.25,4.225) 39(1.75,4.225) 40(1.25,4.225) 41(0.75,4.225) 42(0.25,4.225) 43(-0.25,4.225) 44(-0.75,4.225) 45(-1.25,4.225) 46(-1.75,4.225) 47(-2.25,4.225) 48(-2.75,4.225)
  silkscreen extent -4.35,-3.1 3.1,3.57, body extent -4.5,-4.5 4.5,4.5, height 1.6
"Mounting Hole M2.5 Plated Tight Via" [mm] "M3 Hole Plated Tight Fit with Via Ties"
  round 5.2 hole 2.7: 1(0,0)
"MSOP-8 (INA331) B" [mm] "TSOP, 8-Leads, Body 3,00x3,00mm, Pitch 0,65mm, IPC Medium Density"
  oval 1.35x0.5 smd: 1(-2.225,0.975) 2(-2.225,0.325) 3(-2.225,-0.325) 4(-2.225,-0.975) 5(2.225,-0.975) 6(2.225,-0.325) 7(2.225,0.325) 8(2.225,0.975)
  silkscreen extent -2.35,-1.55 1.15,1.88, body extent -2.45,-1.55 2.45,1.55, height 1.1
"MSOP-8 (LTC1966) B" [mm] "TSOP, 8-Leads, Body 3.00x3.00mm, Pitch 0.65mm, IPC Medium Density"
  oval 1.35x0.5 smd: 1(-2.225,0.975) 2(-2.225,0.325) 3(-2.225,-0.325) 4(-2.225,-0.975) 5(2.225,-0.975) 6(2.225,-0.325) 7(2.225,0.325) 8(2.225,0.975)
  silkscreen extent -2.35,-1.55 1.15,1.9, body extent -2.45,-1.55 2.45,1.55, height 1.1
"Pin Header 3 1 Male Vertical" [mm]
  rect 1.8x1.8 hole 0.9: 1(0,2.54)
  round 1.8 hole 0.9: 2(0,0) 3(0,-2.54)
  silkscreen extent -1.27,-3.81 1.27,3.81, body extent -1.27,-3.81 1.27,3.81, height 9.51
"Pin Header 5 1 Male Vertical" [mm]
  rect 1.8x1.8 hole 0.9: 1(0,5.08)
  round 1.8 hole 0.9: 2(0,2.54) 3(0,0) 4(0,-2.54) 5(0,-5.08)
  silkscreen extent -1.27,-6.35 1.27,6.35, body extent -1.27,-6.35 1.27,6.35, height 9.51
"QFP-32 (ADS124) A" [mm] "TSQFP, 32-Leads, Body 5,00x5,00mm, Pitch 0,50mm, IPC Low Density"
  oval 1.6x0.35 smd: 1(-3.3,1.75) 2(-3.3,1.25) 3(-3.3,0.75) 4(-3.3,0.25) 5(-3.3,-0.25) 6(-3.3,-0.75) 7(-3.3,-1.25) 8(-3.3,-1.75) 17(3.3,-1.75) 18(3.3,-1.25) 19(3.3,-0.75) 20(3.3,-0.25) 21(3.3,0.25) 22(3.3,0.75) 23(3.3,1.25) 24(3.3,1.75)
  oval 0.35x1.6 smd: 9(-1.75,-3.3) 10(-1.25,-3.3) 11(-0.75,-3.3) 12(-0.25,-3.3) 13(0.25,-3.3) 14(0.75,-3.3) 15(1.25,-3.3) 16(1.75,-3.3) 25(1.75,3.3) 26(1.25,3.3) 27(0.75,3.3) 28(0.25,3.3) 29(-0.25,3.3) 30(-0.75,3.3) 31(-1.25,3.3) 32(-1.75,3.3)
  silkscreen extent -3.43,-2.1 2.1,2.6, body extent -3.5,-3.5 3.5,3.5, height 1.2
"RESC3264X09N B" [mm] "Thermal Jumper, 2-Leads, Body 3.20x6.40mm, IPC Medium Density"
  rect 1.15x6.55 smd: 1(-1.475,0) 2(1.475,0)
  silkscreen extent -0.5,-3.18 0.5,3.17, body extent -1.67,-3.26 1.67,3.26, height 0.89
"SO-8 (ST485E) B" [mm] "SOIC, 8-Leads, Body 4,90x3,90mm, Pitch 1,27mm, IPC Medium Density"
  oval 1.45x0.6 smd: 1(-2.725,1.905) 2(-2.725,0.635) 3(-2.725,-0.635) 4(-2.725,-1.905) 5(2.725,-1.905) 6(2.725,-0.635) 7(2.725,0.635) 8(2.725,1.905)
  silkscreen extent -2.85,-2.5 1.6,2.73, body extent -3,-2.5 3,2.5, height 1.75
"SOIC-8 (D008A) B" [mm] "SOIC, 8-Leads, Body 4,91x3,90mm, Pitch 1,27mm, IPC Medium Density"
  oval 1.45x0.6 smd: 1(-2.725,1.905) 2(-2.725,0.635) 3(-2.725,-0.635) 4(-2.725,-1.905) 5(2.725,-1.905) 6(2.725,-0.635) 7(2.725,0.635) 8(2.725,1.905)
  silkscreen extent -2.85,-2.5 1.6,2.73, body extent -3,-2.5 3,2.5, height 1.75
"SON (DRV006B) EP B" [mm] "SON, 6-Leads, Body 2.00x2.00mm, Pitch 0.65mm, Thermal Pad 1.60x0.89mm, IPC Medium Density"
  rect 0.7x0.3 smd: 1(-0.995,0.65) 2(-0.995,0) 3(-0.995,-0.65) 4(0.995,-0.65) 5(0.995,0) 6(0.995,0.65)
  rect 0.89x1.6 smd: 7(0,0)
  silkscreen extent -1.5,-1.2 1.05,1.25, body extent -1.05,-1.05 1.05,1.05, height 0.8
"SOT323 (DMN601WK) B" [mm] "SOT23, 3-Leads, Body 2,05x2,10mm, Pitch 0,65mm, IPC Medium Density"
  rect 0.8x0.5 smd: 1(-1.075,0.65) 2(-1.075,-0.65) 3(1.075,0)
  silkscreen extent -1.2,-1.15 0.67,1.57, body extent -1.1,-1.15 1.1,1.15, height 1.1
"SOT-5 (DCK0005A) A" [mm] "SOT23, 5-Leads, Body 2,00x2,10mm, Pitch 0,65mm, IPC Low Density"
  rect 1.05x0.5 smd: 1(-1.225,0.65) 2(-1.225,0) 3(-1.225,-0.65) 4(1.225,-0.65) 5(1.225,0.65)
  silkscreen extent -0.3,-1.1 0.3,1.1, body extent -1.2,-1.07 1.2,1.07, height 1.1
"SOT-23 (BAT45CL) A" [mm] "SOT23, 3-Leads, Body 2,92x2,37mm, Pitch 0,95mm, IPC Low Density"
  rect 1.2x0.65 smd: 1(-1.3,0.95) 2(-1.3,-0.95) 3(1.3,0)
  silkscreen extent -1.42,-1.5 0.7,1.95, body extent -1.32,-1.52 1.32,1.52, height 1.11
"SOT-23-6 (USBLC6-2SC6 ST) B" [mm] "SOT23, 6-Leads, Body 2.93x2.80mm, Pitch 0.95mm, IPC Medium Density"
  rect 1x0.6 smd: 1(-1.375,0.95) 2(-1.375,0) 3(-1.375,-0.95) 4(1.375,-0.95) 5(1.375,0) 6(1.375,0.95)
  silkscreen extent -1.5,-1.55 0.5,1.92, body extent -1.5,-1.53 1.5,1.53, height 1.45
"TC2070 NL" [mm] "SWD Connector No Legs"
  round 0.79 smd paste-0.8: 1(-3.81,-0.635) 2(-2.54,-0.635) 3(-1.27,-0.635) 4(0,-0.635) 5(1.27,-0.635) 6(2.54,-0.635) 7(3.81,-0.635) 8(3.81,0.635) 9(2.54,0.635) 10(1.27,0.635) 11(0,0.635) 12(-1.27,0.635) 13(-2.54,0.635) 14(-3.81,0.635)
  round 1 hole 0.991 unplated mask+0: MH0(-5.08,0) MH1(5.08,1.016) MH2(5.08,-1.016)
  silkscreen extent -5.84,-1.9 5.84,1.91
"Test Point Keystone 5000" [mm] "Keystone Test Point Insulated Ring 1mm"
  round 1.8 hole 1: 1(0,0)
  silkscreen extent -1.2,-1.2 1.4,1.2, body extent -1.26,-1.27 1.26,1.27, height 4.58
"Test Point Keystone 5001" [mm] "Keystone Test Point Insulated Ring 1mm"
  round 1.8 hole 1: 1(0,0)
  silkscreen extent -1.2,-1.2 1.4,1.2, body extent -1.26,-1.27 1.26,1.27, height 4.58
"Test Point Pad 0.6mm" [mm] "Test Point Pad 0.6mm with Ring"
  round 0.6 smd paste-10: 1(0,0)
"Test Point Pad 1.0mm" [mm]
  round 1 smd: 1(0,0)
  silkscreen extent -0.81,-0.81 0.81,0.81
"TO-252 (MJD32C) B" [mm] "D-PAK, 3-Pads, Body 6,20x6,66mm (max), IPC Medium Density"
  rect 2.6x1 smd: 1(-4.15,2.28) 3(-4.15,-2.28)
  rect 6.2x4.9 smd: 4(2.35,0)
  silkscreen extent -2.1,-3.3 -1.15,3.3, body extent -4.22,-3.3 5.5,3.3, height 2.43